# Altium PCB DIO_8SMA_8MCX.PcbDoc (part 1 of 9)
Units mm, origin at the board's own origin, x right, y up, seen from the top; angles counter-clockwise.
Board outline 222.9 x 100 mm, 6 copper layers (TopLayer, L2, L3, L4, L5, Bottom Layer), stack 1.492 mm thick; 542 components, 326 nets, 1968 pads, 1583 vias.
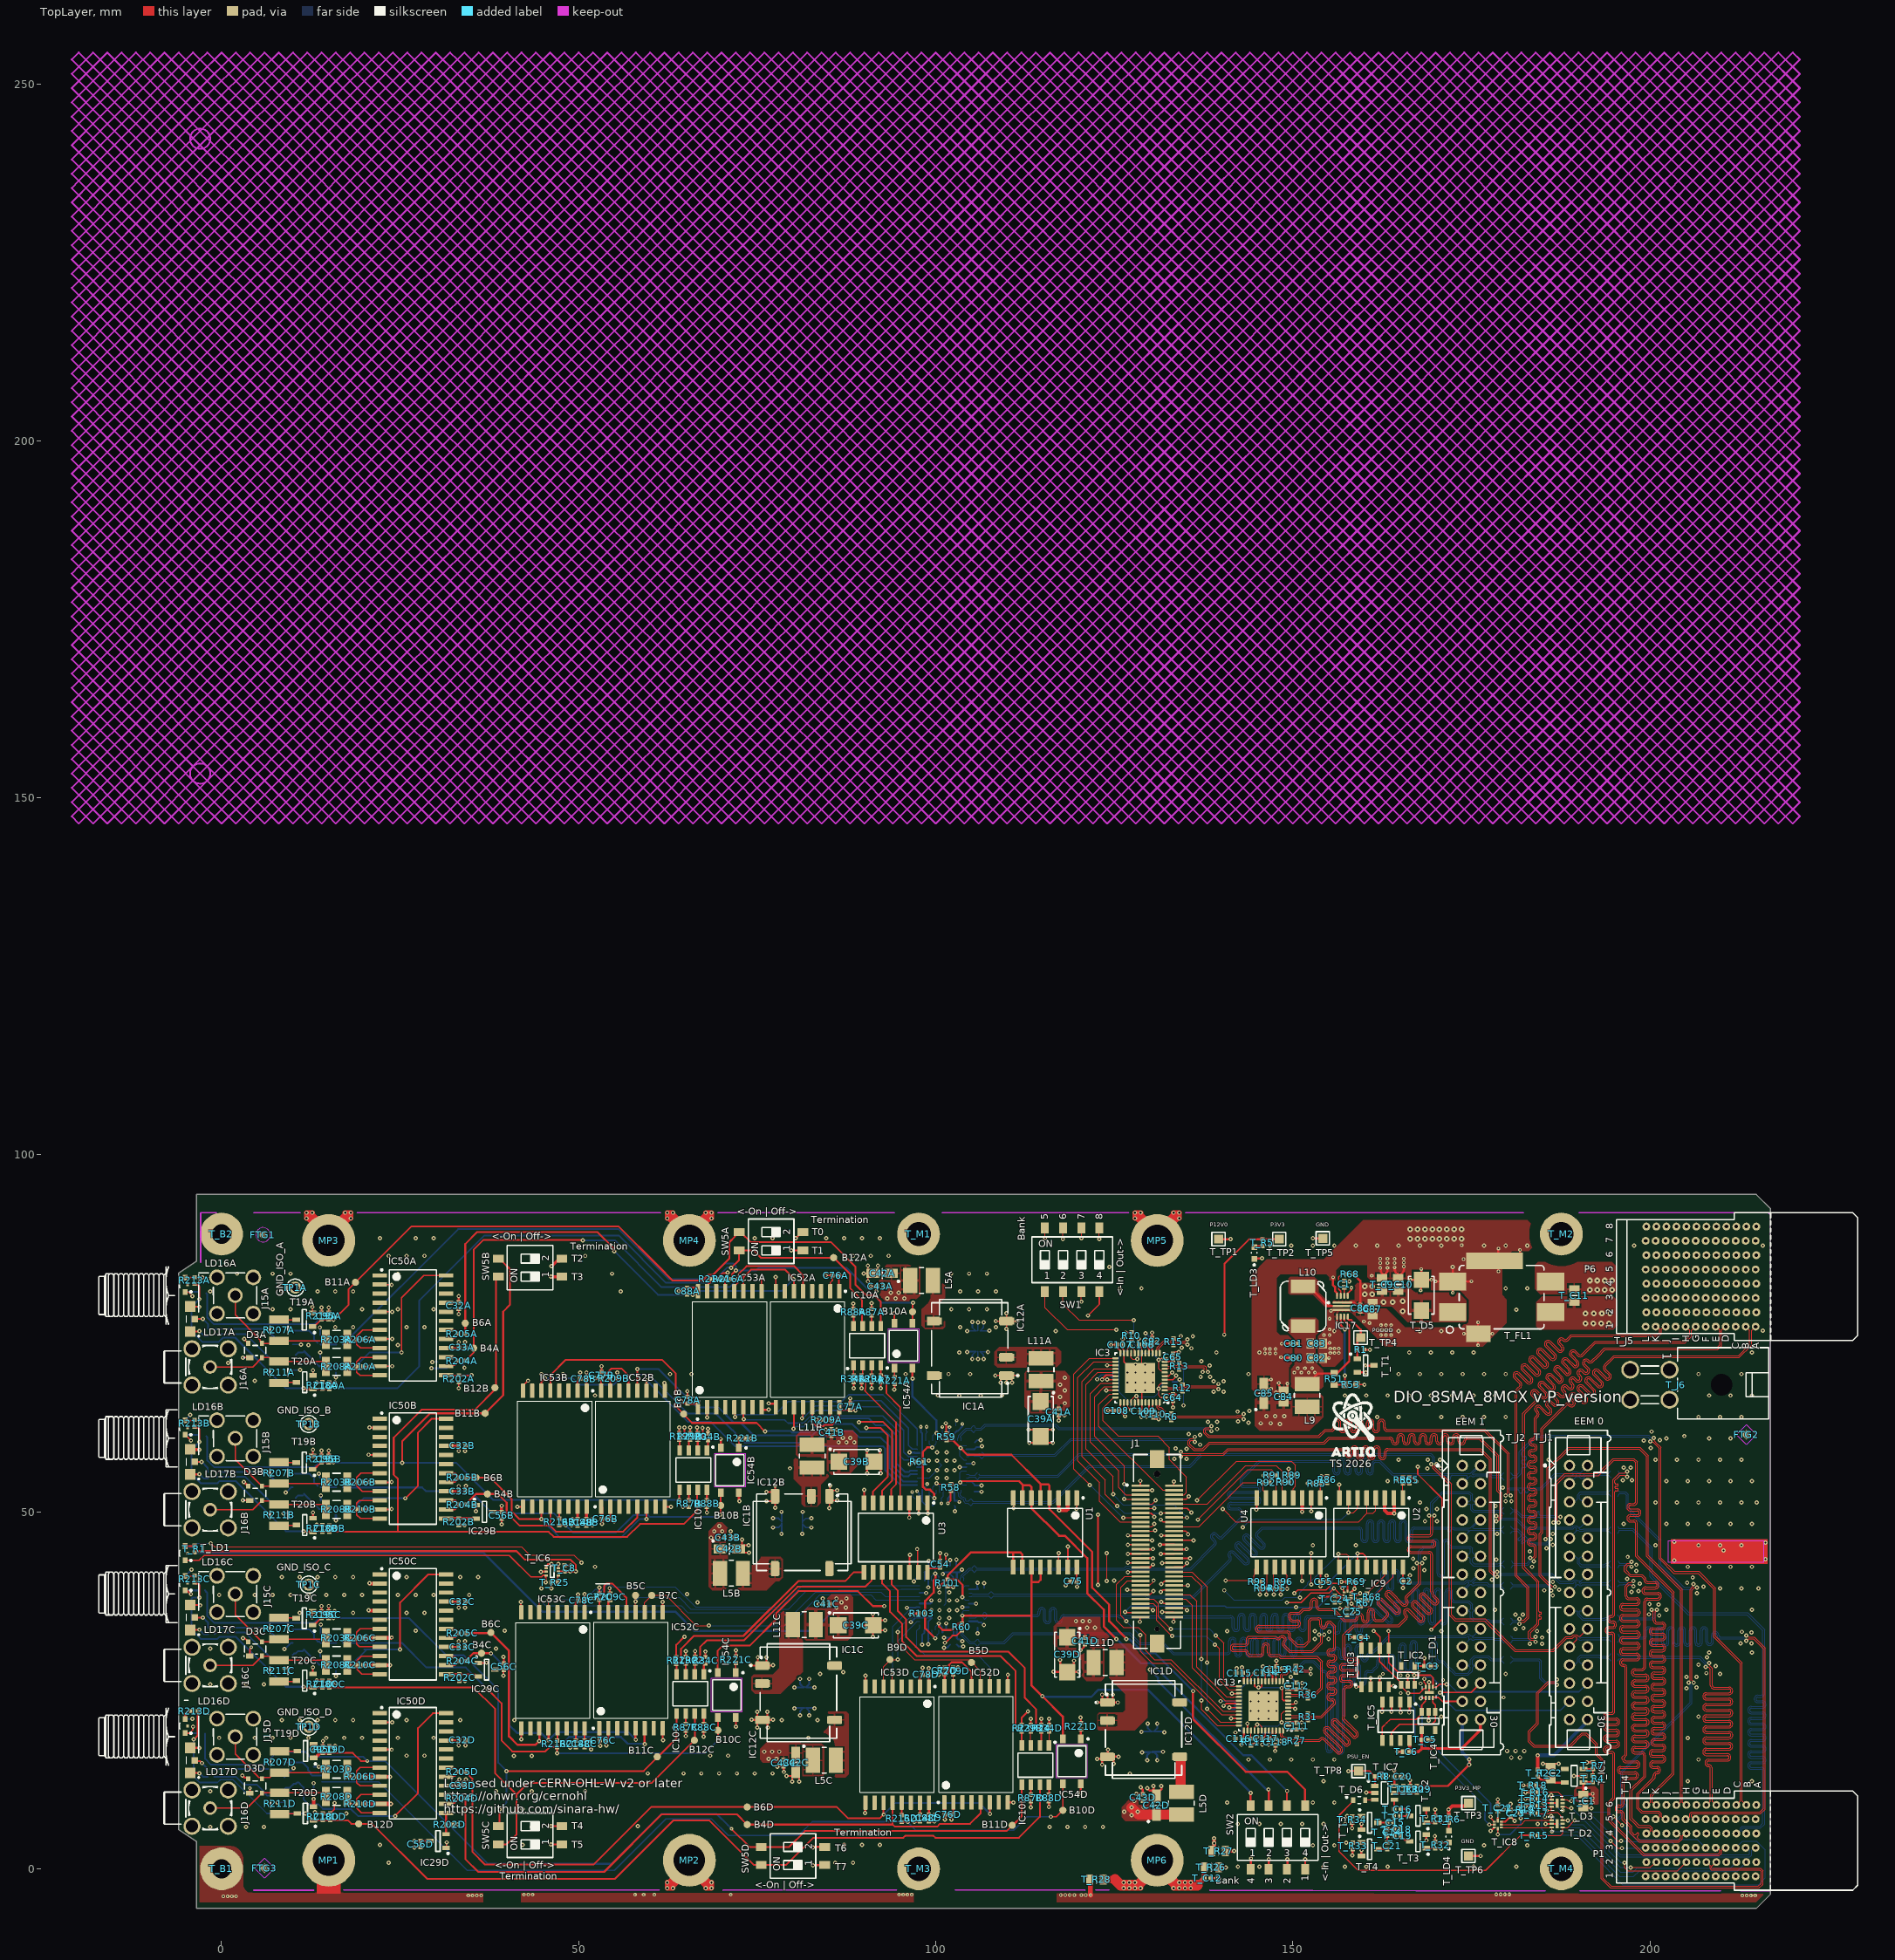
[diagram p0: TopLayer view]
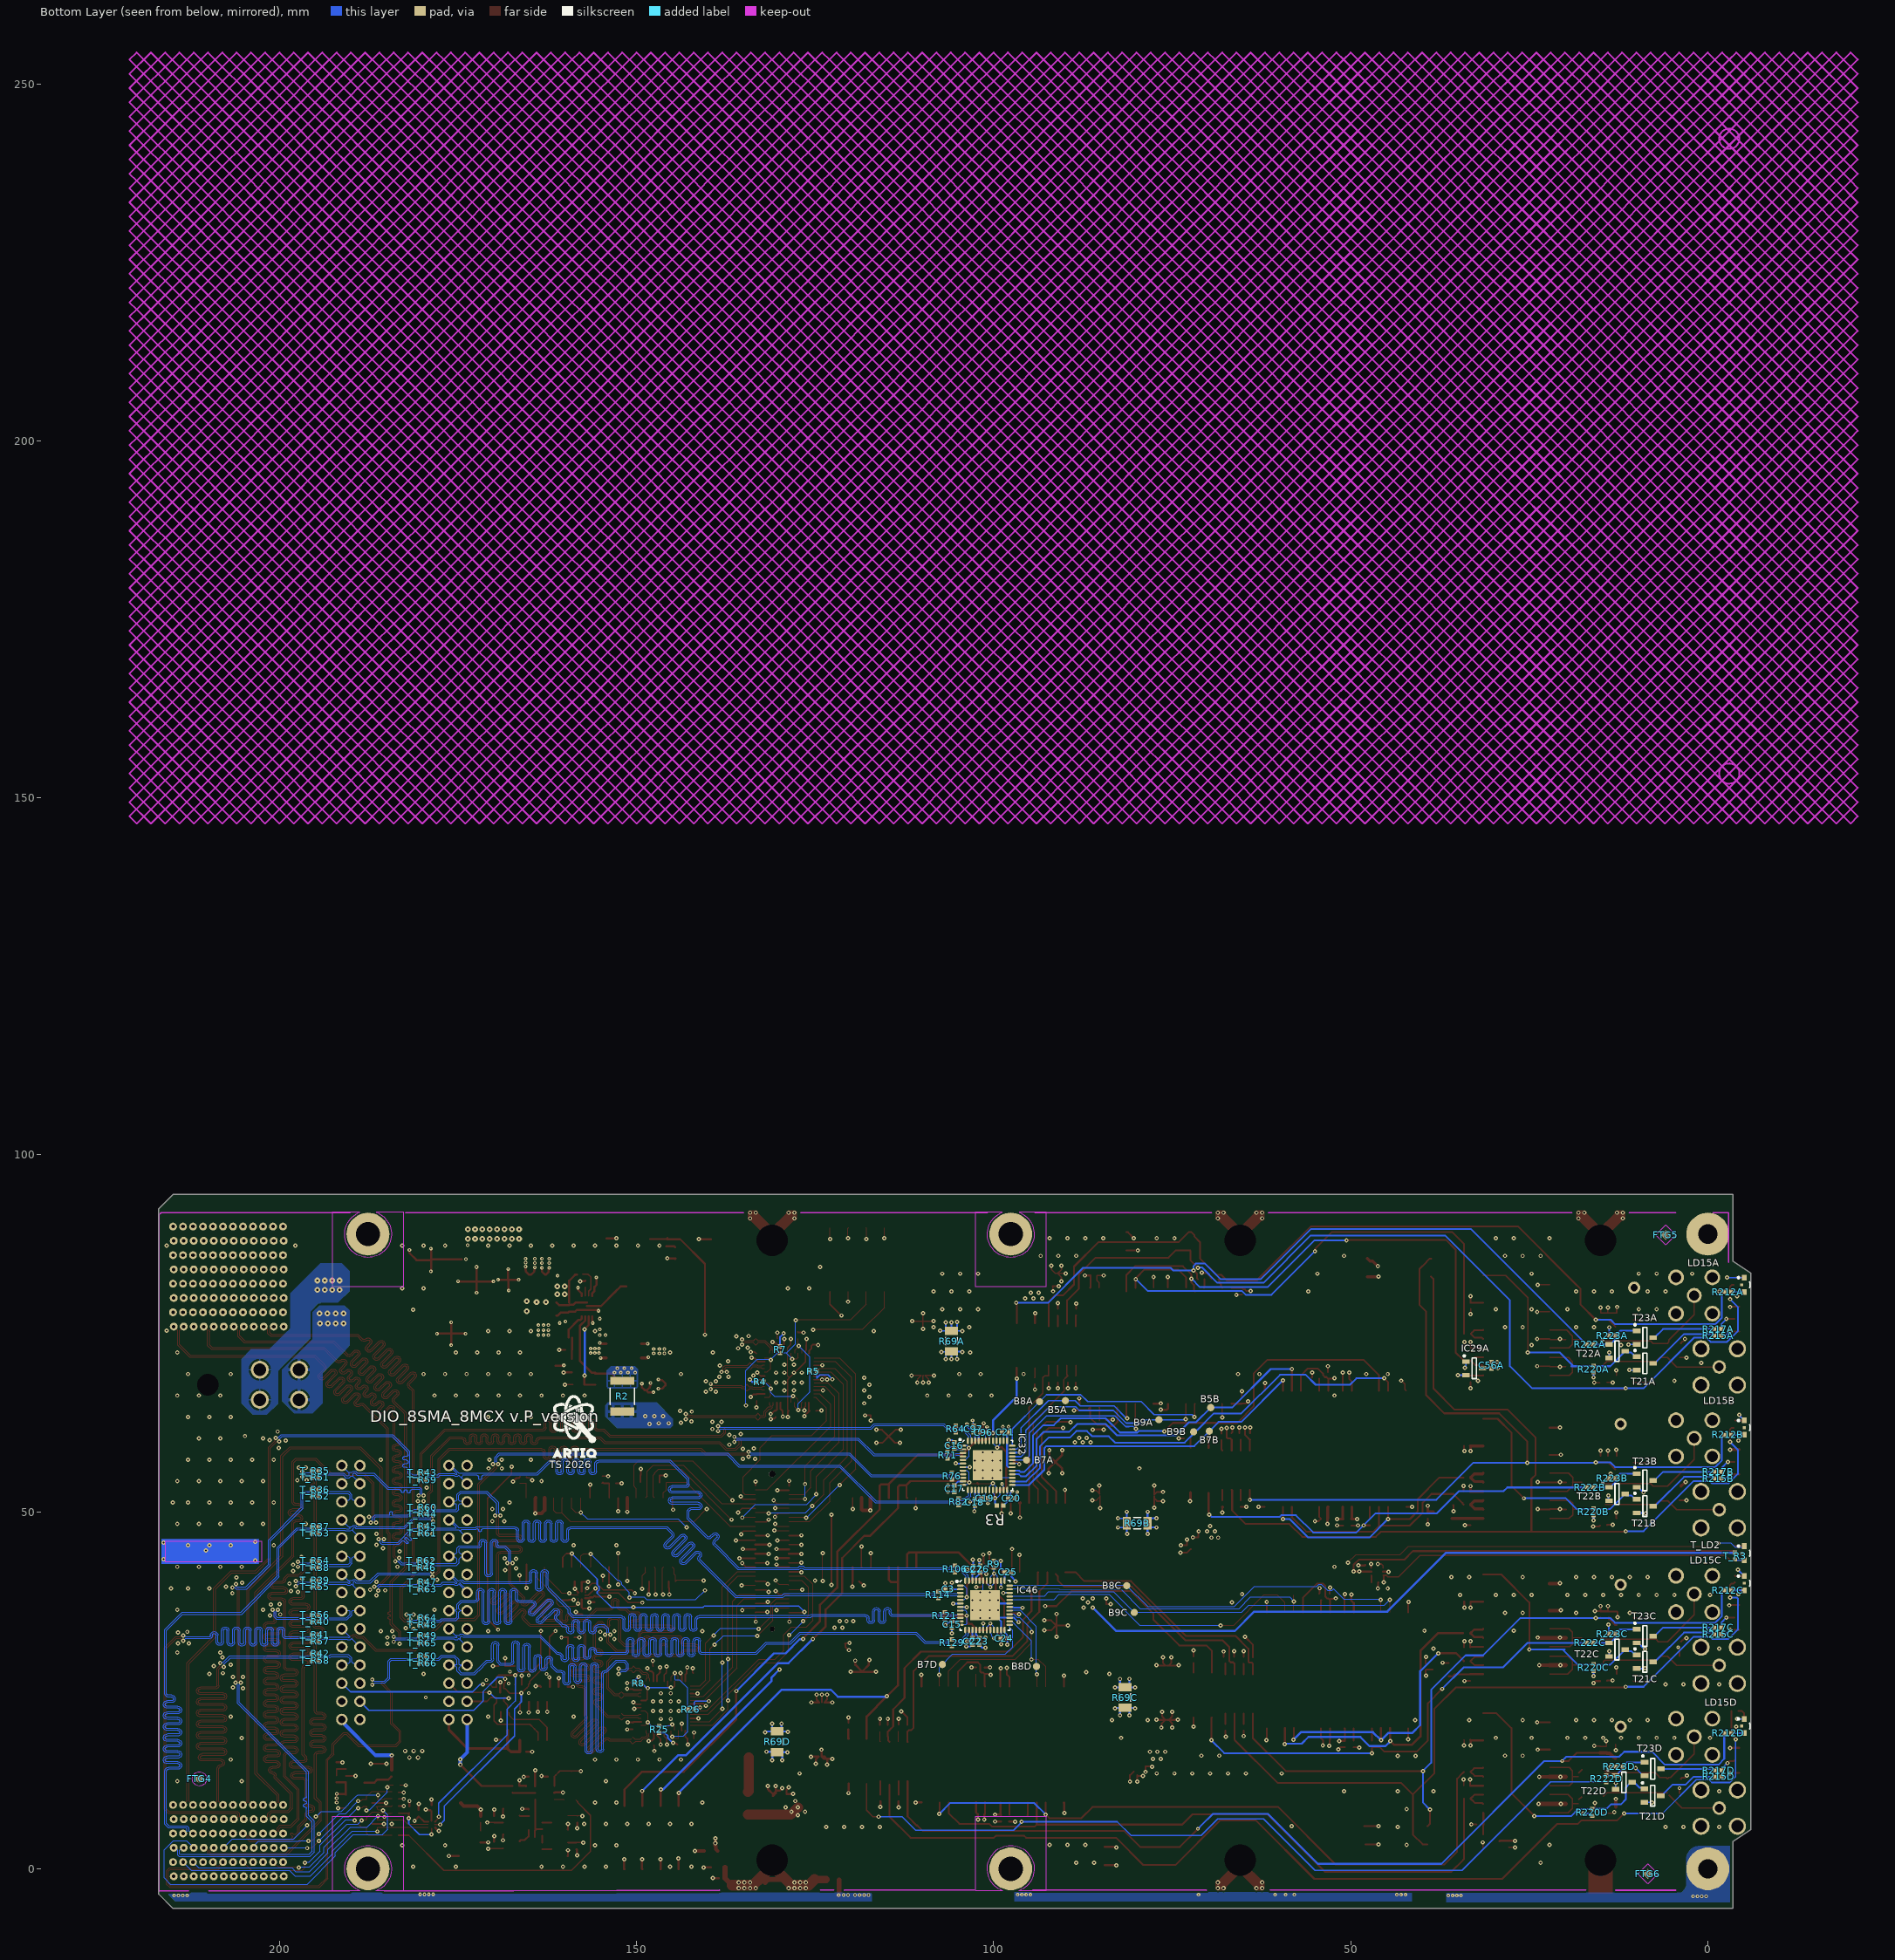
[diagram p1: Bottom Layer view, seen from below]
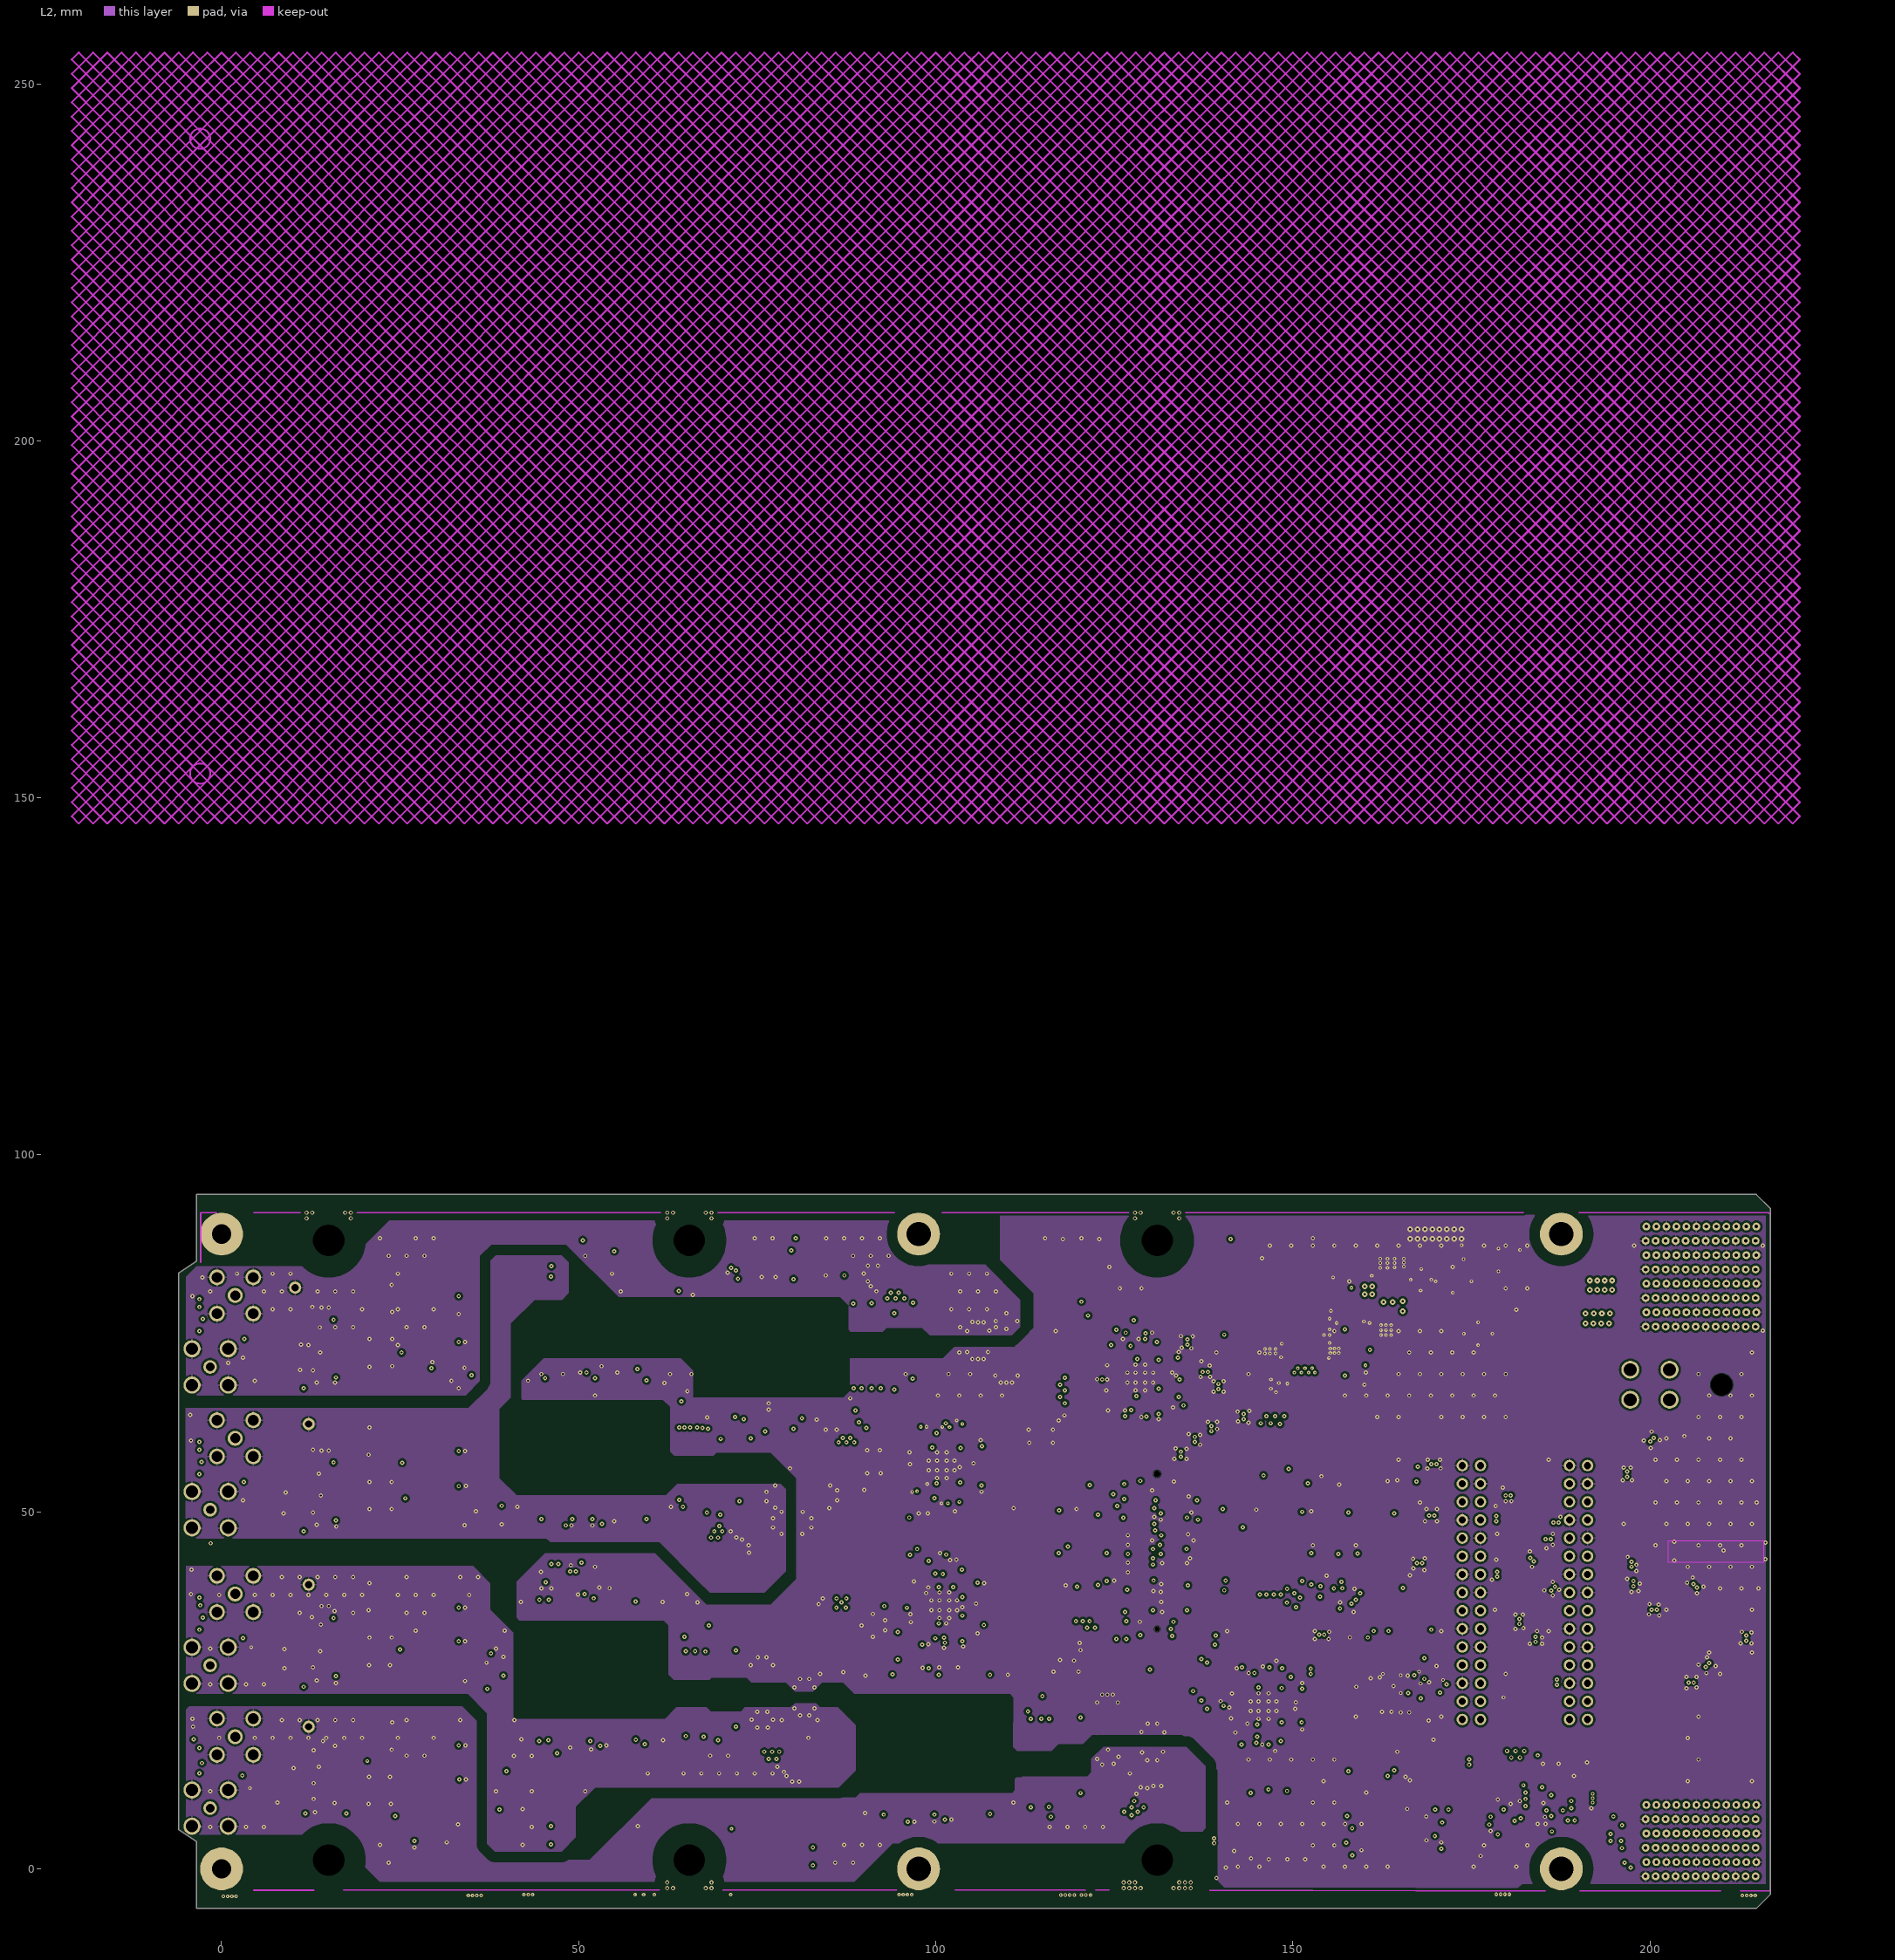
[diagram p2: L2]
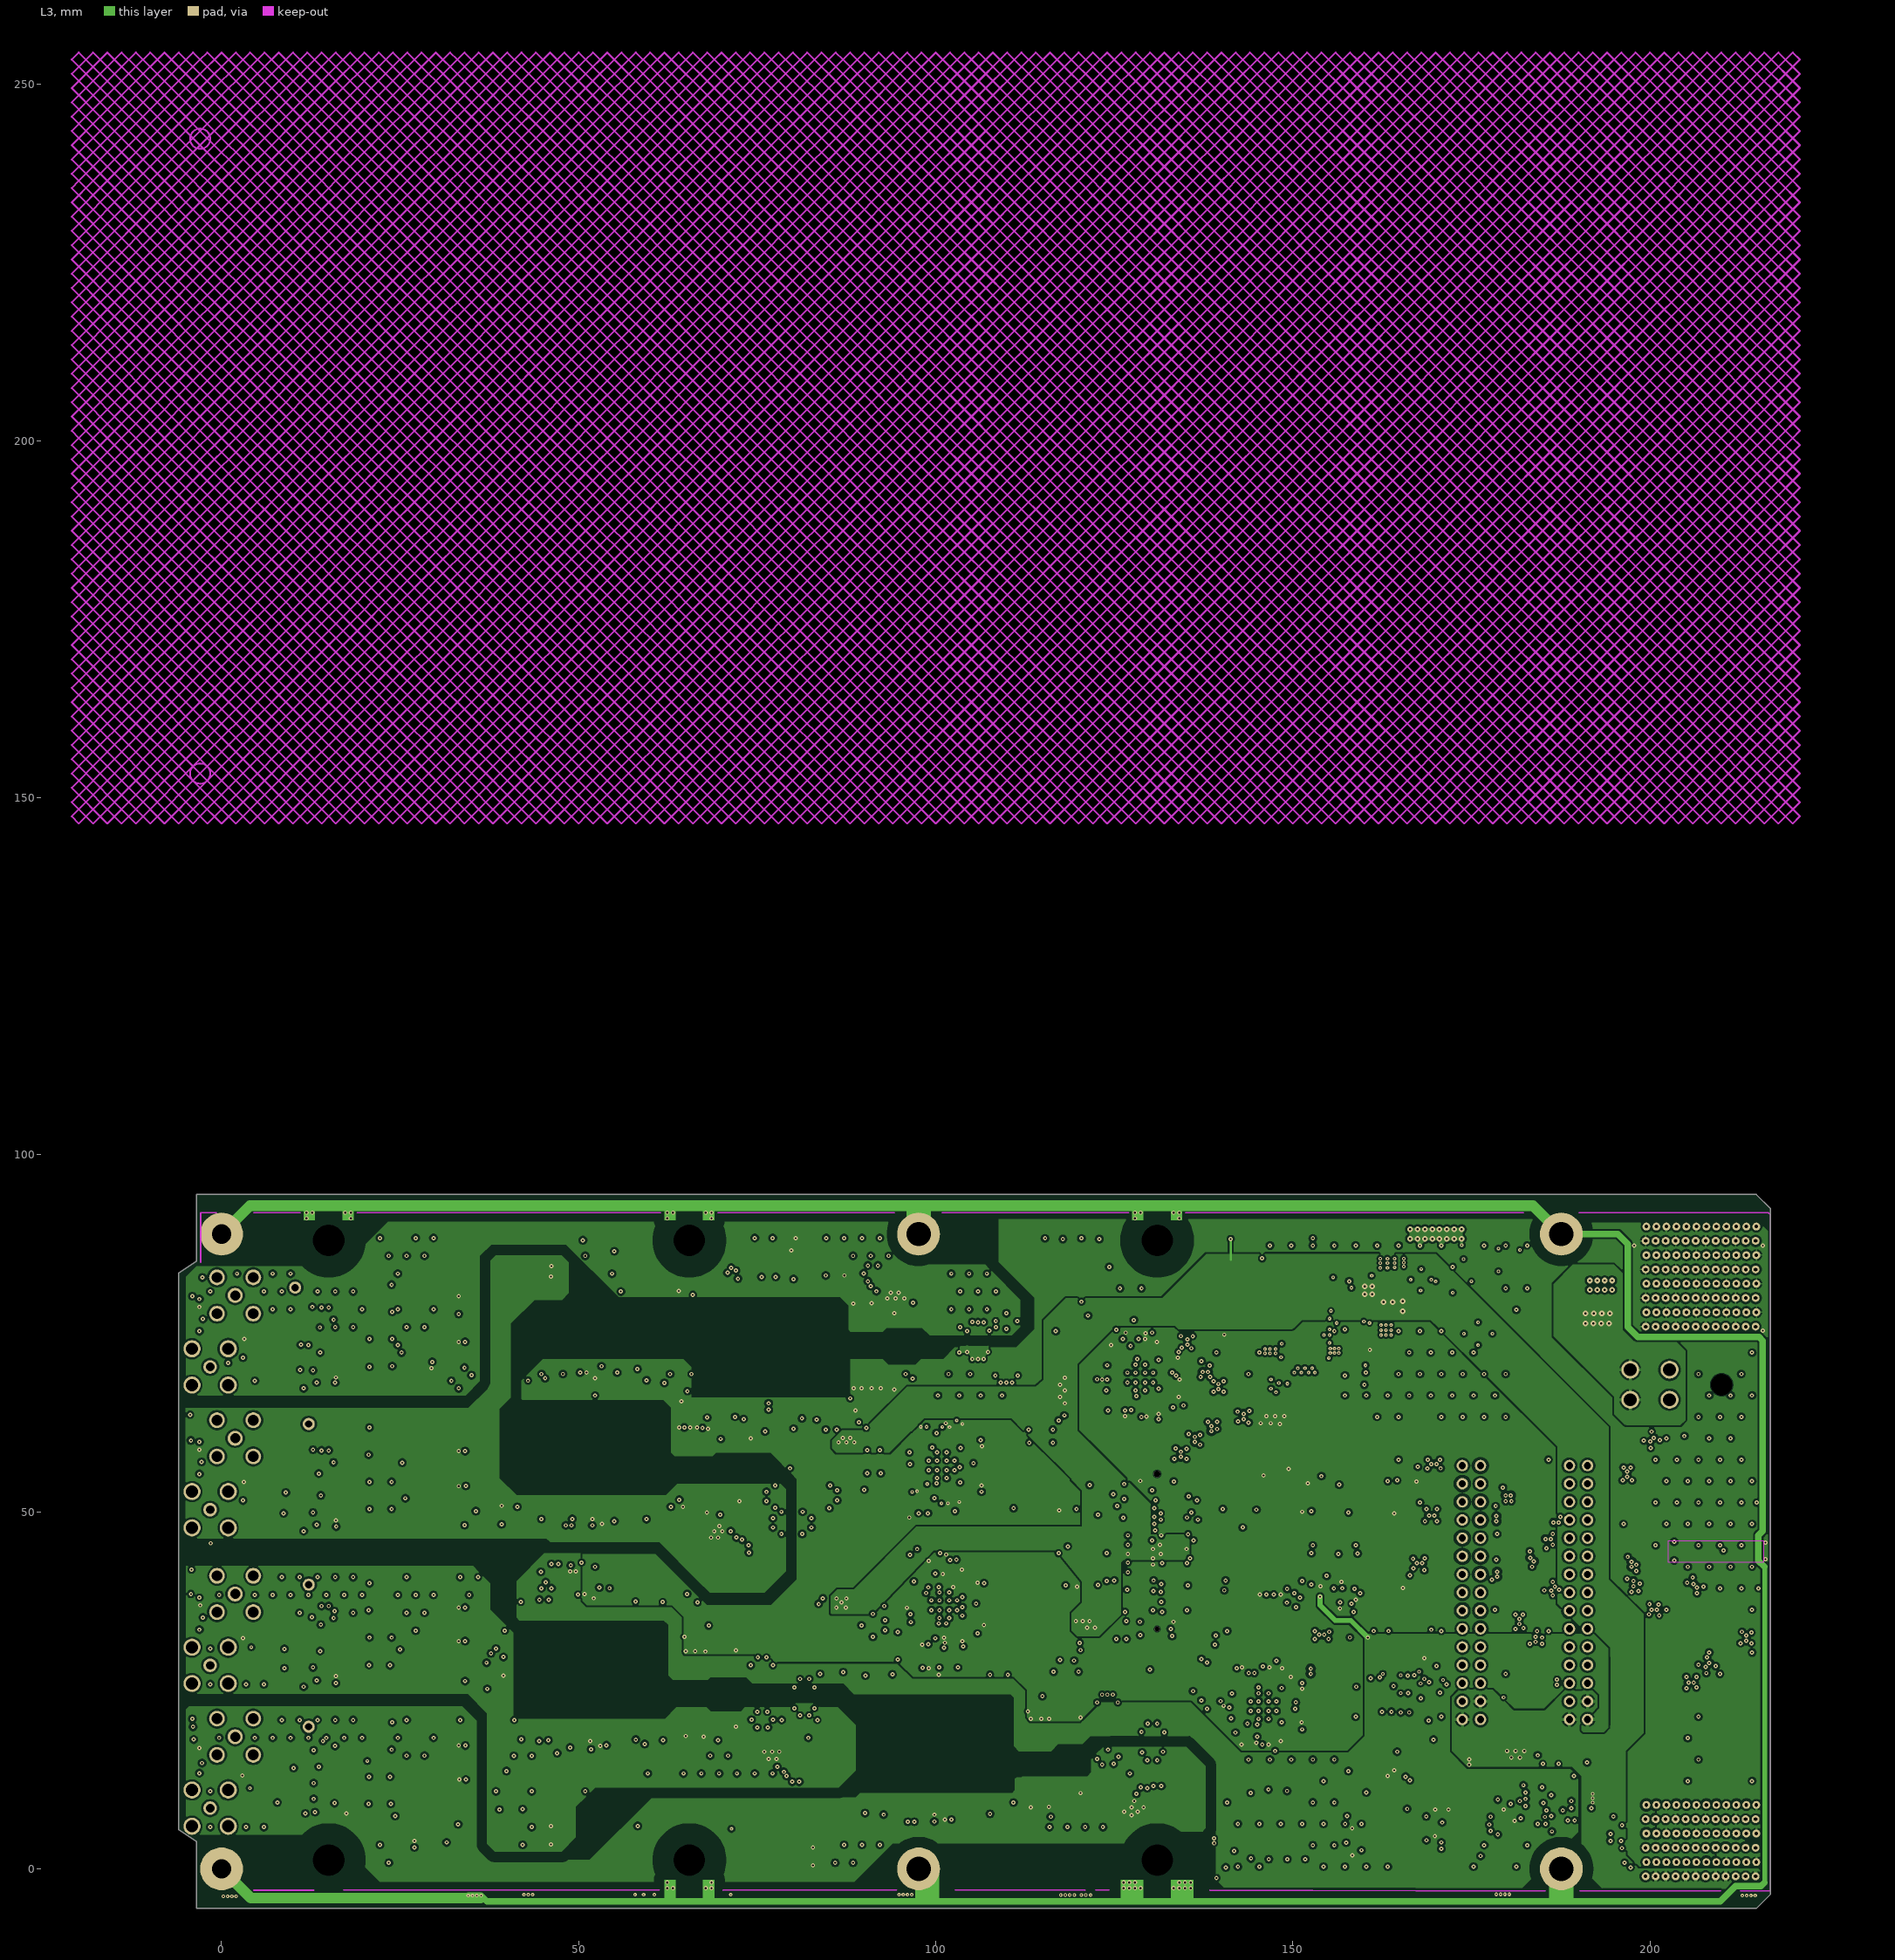
[diagram p3: L3]
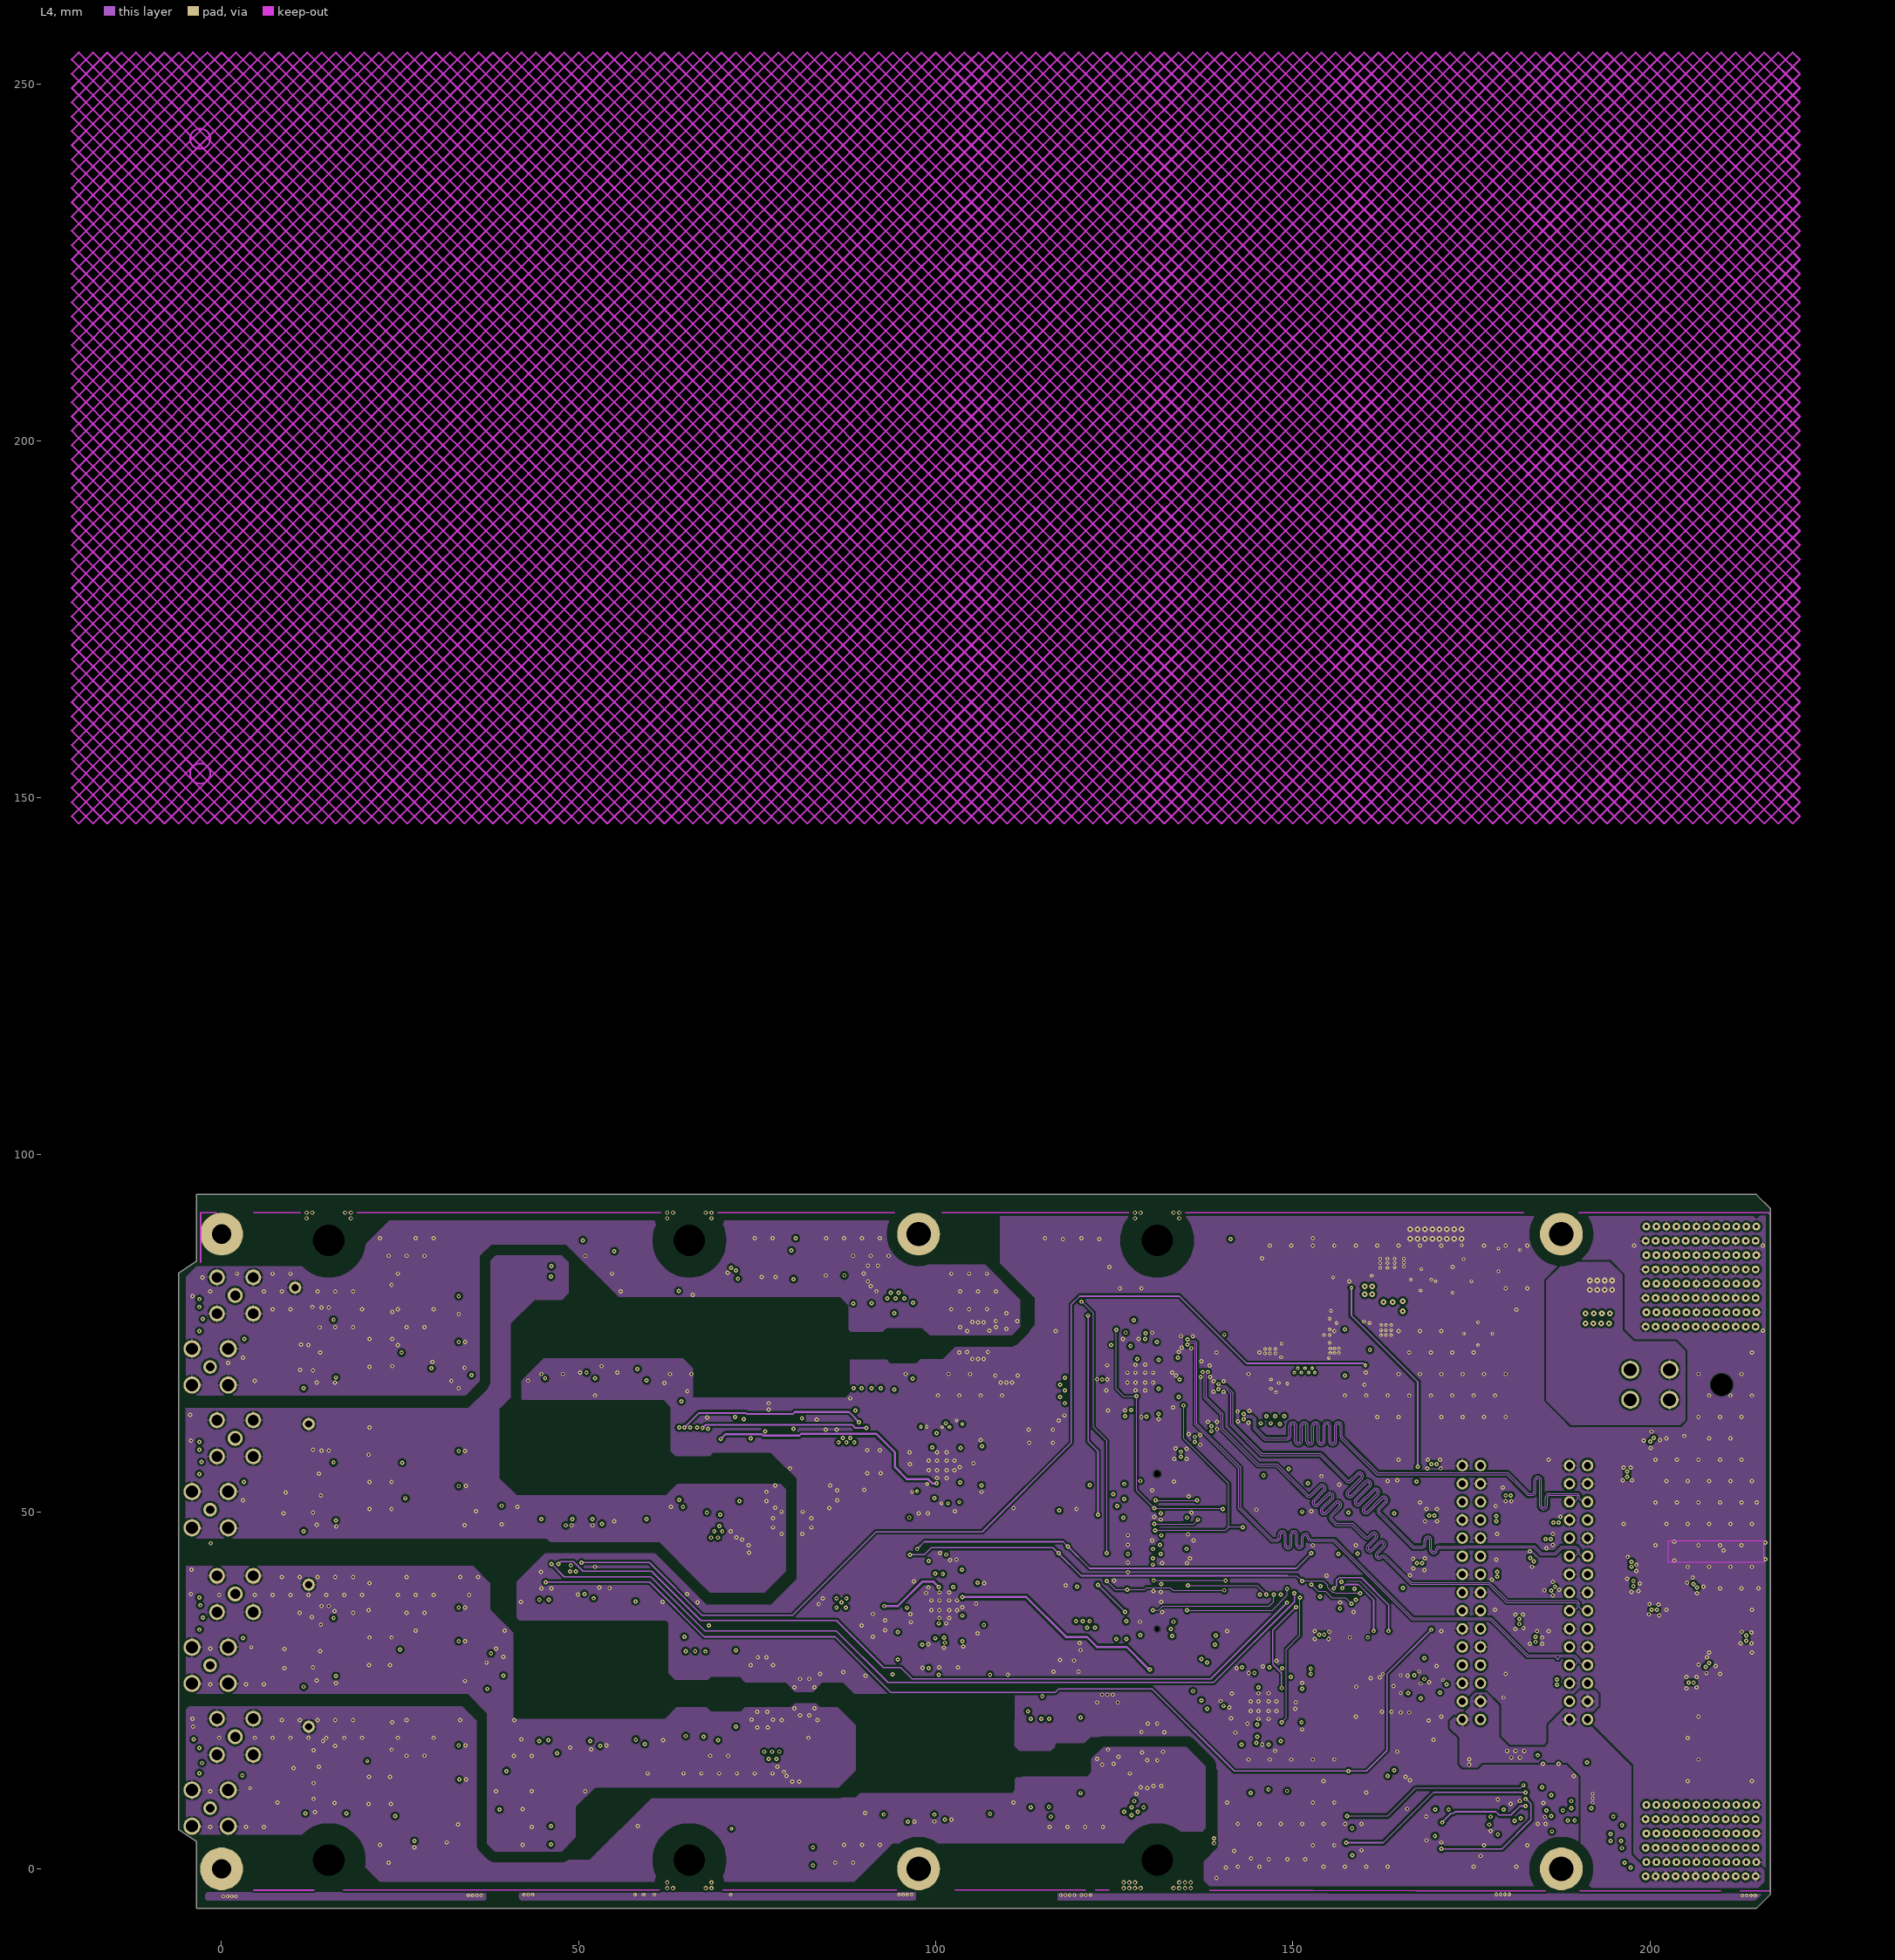
[diagram p4: L4]
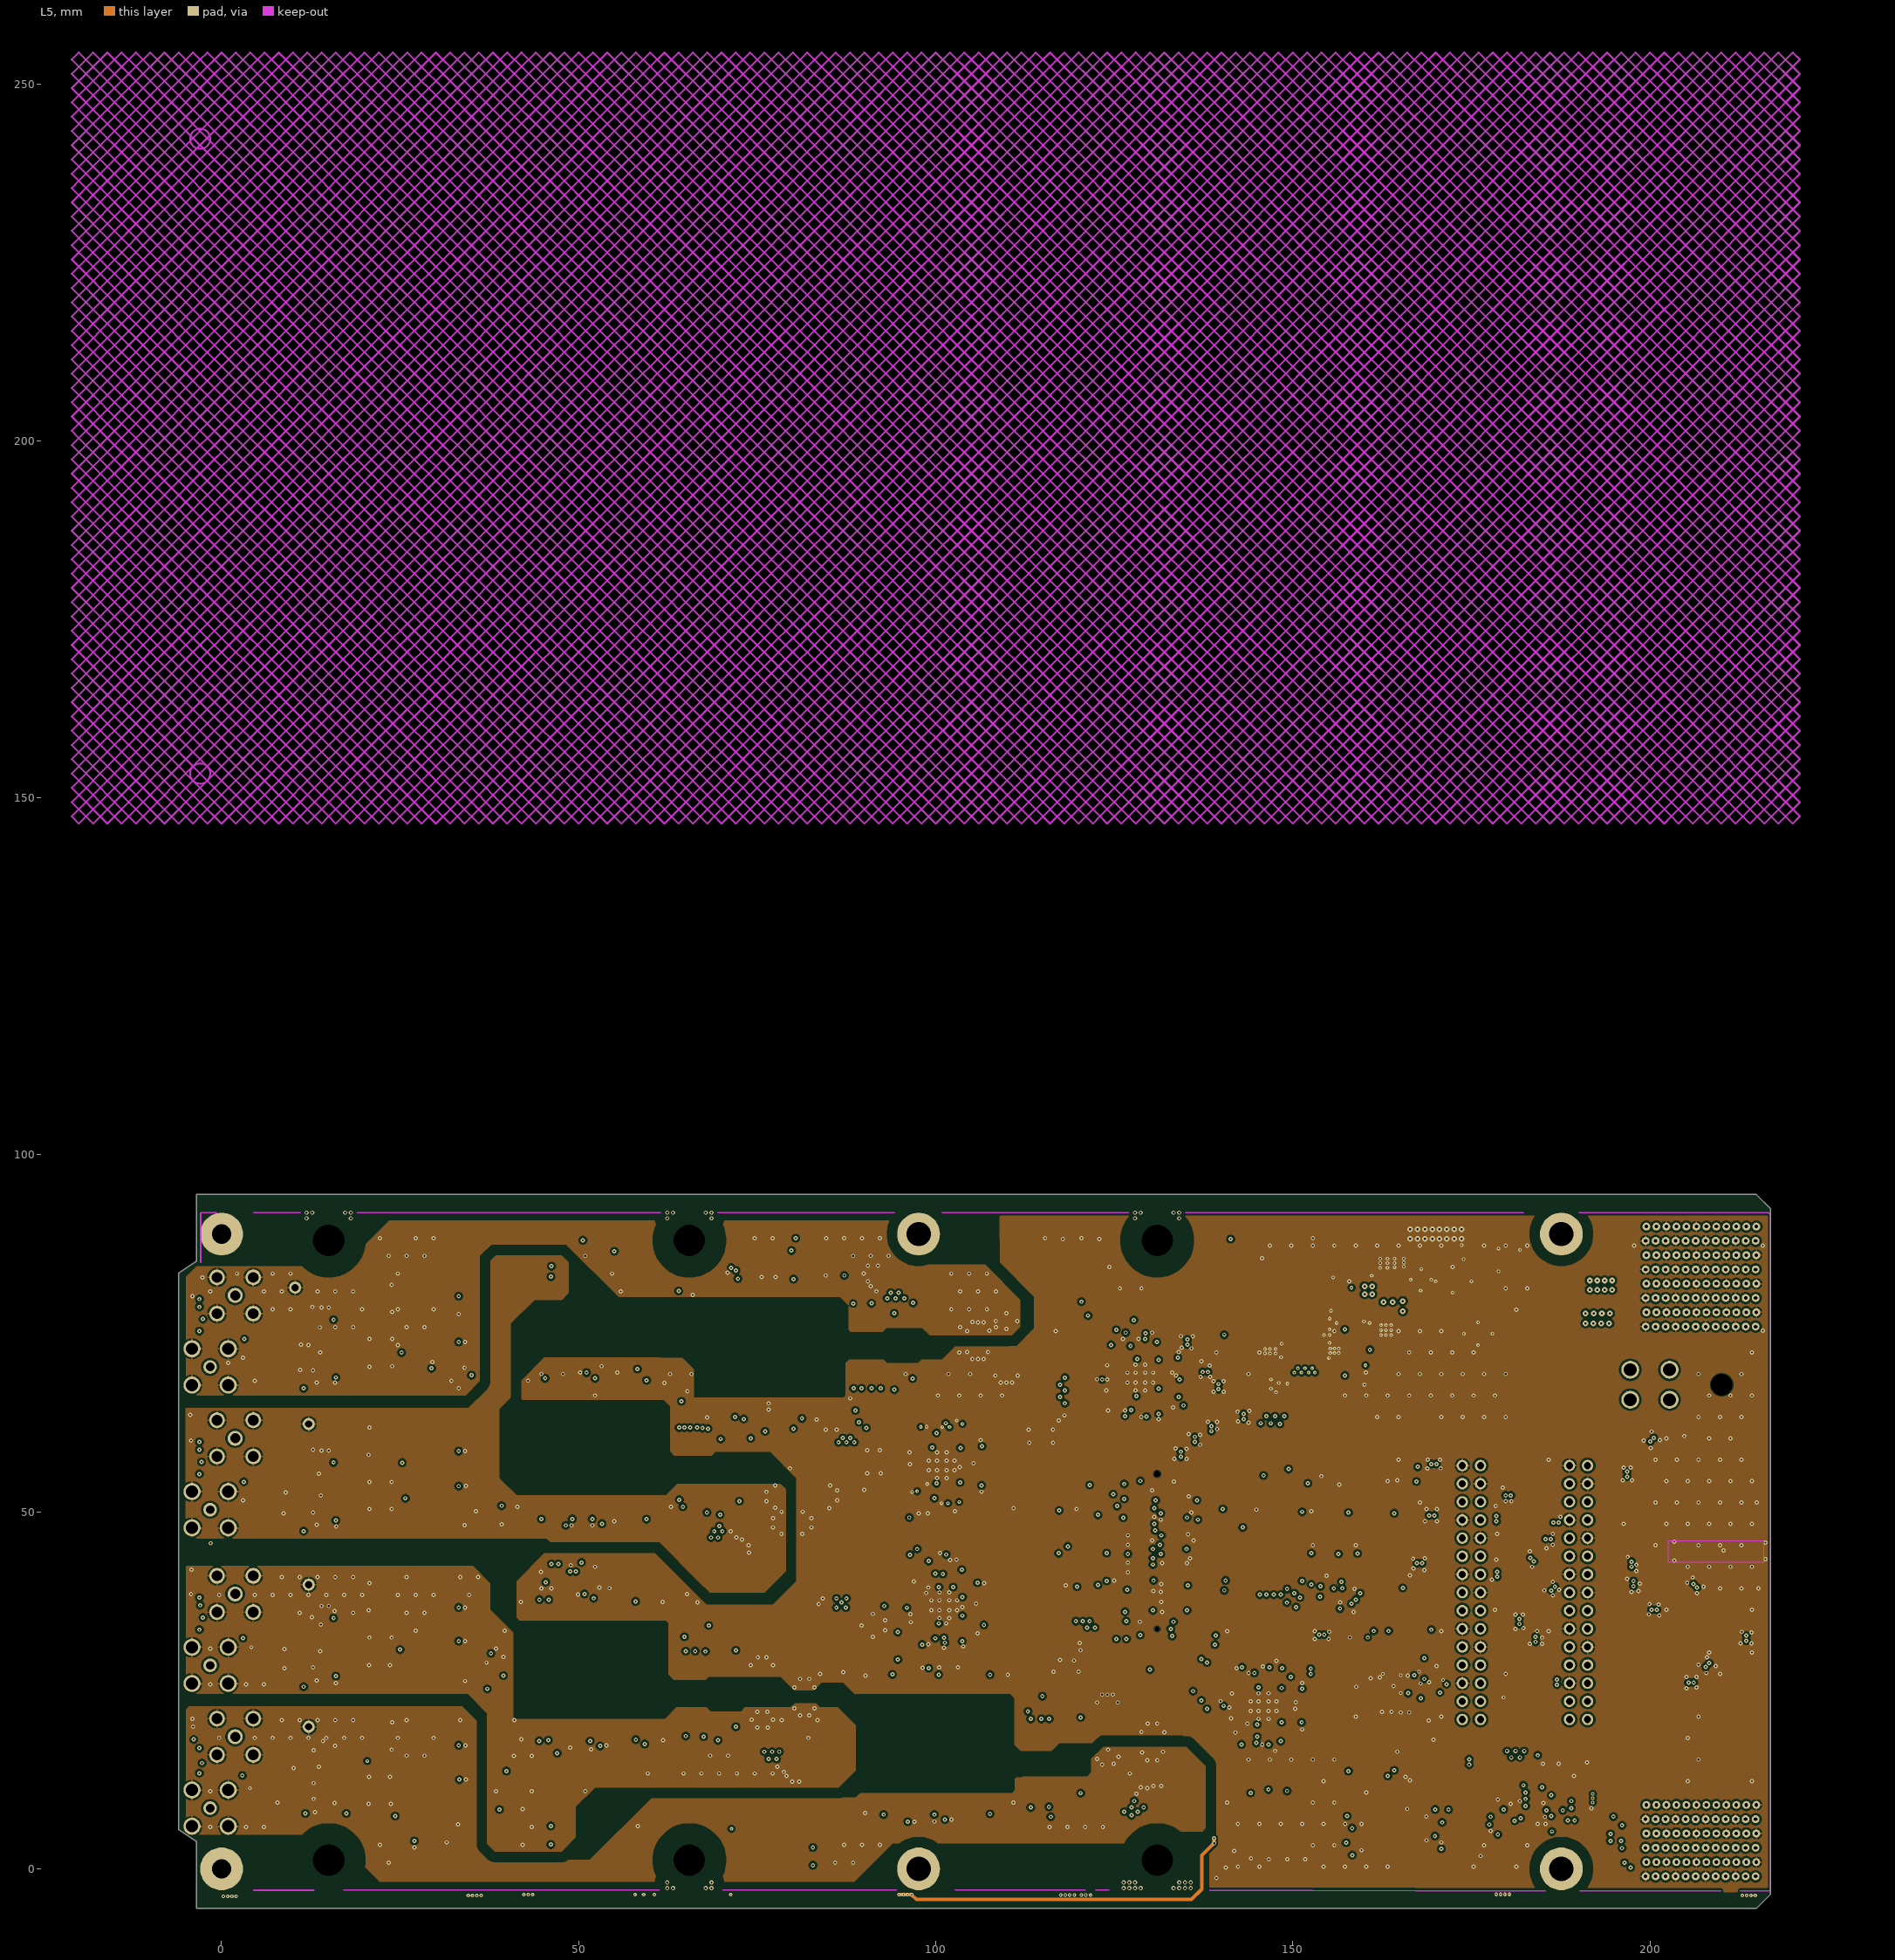
[diagram p5: L5]

## Layer stack, top to bottom
TopSolder: solder mask 0.022, Solder Resist, Dk 3.5
TopLayer: signal copper 0.035
Dielectric1: core 0.11, FR-4, Dk 4.4
L2: signal copper 0.018
Dielectric2: prepreg 0.2, FR-4, Dk 4.2
L3: signal copper 0.018
Dielectric3: core 0.73, FR-4, Dk 4.2
L4: signal copper 0.018
Dielectric 3: prepreg 0.2, FR-4, Dk 4.2
L5: signal copper 0.018
Dielectric 4: core 0.11, FR-4, Dk 4.4
Bottom Layer: signal copper 0.035
BottomSolder: solder mask 0.022, Solder Resist, Dk 3.5

## Board outline
-6,5.45 -6,83.45 -3.5,85.1 -3.5,94.45 214.9,94.45 216.9,92.45 216.9,-3.55 214.9,-5.55 -3.5,-5.55 -3.5,3.8

## Design rules (kind name [scope] priority, off if disabled: settings)
AcuteAngle [All] p1: minimum=4.50000000000000E+0001 checktracksonly=FALSE
AssemblyTestPointUsage [All] p1 off:
AssemblyTestpoint [All] p1 off: testpointundercomponent=TRUE minsize=1.016 maxsize=2.54 preferedsize=1.524 minholesize=0 maxholesize=1.016 preferedholesize=0.813 testpointgrid=0.025 usegrid=TRUE gridtolerance=0 allowsidetop=TRUE allowsidebottom=TRUE
BoardOutlineClearance BoardOutlineClearance_1 [OnLayer('BottomOverlay', 'TopOverlay')] p1: gap=0 ignorepadtopadclearanceinfootprint=FALSE
BoardOutlineClearance [All] p2: gap=0.4 ignorepadtopadclearanceinfootprint=FALSE
Clearance Clearance_MP-keepout [InComponent('T_M*') or InComponent('T_B*') or InComponent('M*') vs IsKeepOut] p1: gap=0 ignorepadtopadclearanceinfootprint=FALSE
Clearance Clearance_CHASSIS-MPx [InComponent('MP*') vs Not (InNet('CHASSIS') or InNet('STRIP2') or InNet('STRIP3'))] p2: gap=3 ignorepadtopadclearanceinfootprint=FALSE except(1.5: Arc-SMDPad Arc-THPad Track-SMDPad Track-THPad SMDPad-SMDPad SMDPad-THPad SMDPad-Via SMDPad-Fill SMDPad-Poly SMDPad-Region SMDPad-Text THPad-THPad THPad-Via THPad-Fill THPad-Poly THPad-Region THPad-Text)
Clearance Clearance_CHASSIS-_T_Bx_T_Mx [InComponent('T_B*') or InComponent('T_M*') vs Not (InNet('CHASSIS') or InNet('STRIP2') or InNet('STRIP3'))] p3: gap=1.5 ignorepadtopadclearanceinfootprint=FALSE
Clearance Clearance_CHASSIS-ISO [InNetClass('GND_ISO') or InNetClass('PWR_ISO') vs InNet('CHASSIS') or InNet('STRIP2') or InNet('STRIP3')] p4: gap=1.5 ignorepadtopadclearanceinfootprint=FALSE
Clearance Clearance_PWR_ISO_CH [InNetClass('PWR_ISO') vs InNetClass('PWR_ISO')] p5: gap=1.5 ignorepadtopadclearanceinfootprint=FALSE
Clearance Clearance_GND_ISO_CH [InNetClass('GND_ISO') vs InNetClass('GND_ISO')] p6: gap=1.5 ignorepadtopadclearanceinfootprint=FALSE
Clearance Clearance_ISO-poly [InNetClass('GND_ISO') or InNetClass('PWR_ISO') vs InPolygon and NOT (InNetClass('GND_ISO') or InNetClass('PWR_ISO'))] p7: gap=1.5 ignorepadtopadclearanceinfootprint=FALSE
Clearance Clearance_xSigToGND [InAnyxSignal vs InNamedPolygon('P3V3')] p8: gap=0.4 ignorepadtopadclearanceinfootprint=TRUE
Clearance [All] p9: gap=0.12 ignorepadtopadclearanceinfootprint=FALSE except(0.3: Arc-Poly Track-Poly SMDPad-Poly THPad-Poly Via-Poly Fill-Poly Poly-Poly)
ComponentClearance ComponentClearance_Front_Panel [InComponent('LD15*') or InComponent('LD16*') or InComponent('LD17*') or InComponent('J15*') or InComponent('J16*') Or InComponent('LD11') or InComponent('LD14') or InComponent('T_B1') or InComponent('T_B2') or InComponent('T_LD2') or InComponent('T_LD1') vs Identifier='Dio8Sma8Mcx-A01.iam.v1'] p1: gap=-1 collisioncheckmode=3 verticalgap=-1 showdistances=TRUE
ComponentClearance ComponentClearance_Screws [InComponent('T_M*') vs IsKeepOut] p2: gap=-1 collisioncheckmode=3 verticalgap=-1 showdistances=FALSE
ComponentClearance ComponentClearance_ISO [InComponent('IC12*') vs InComponent('IC1*')] p3: gap=-1 collisioncheckmode=3 verticalgap=-1 showdistances=FALSE
ComponentClearance ComponentClearance_Enclosure [InComponent('T_M*') vs OnTop] p4: gap=-1 collisioncheckmode=3 verticalgap=-1 showdistances=TRUE
ComponentClearance ComponentClearance_4 [InComponent('HS1') vs InComponent('IC4')] p5: gap=0 collisioncheckmode=3 verticalgap=0 showdistances=FALSE
ComponentClearance ComponentClearance_3 [Identifier = '2';] p6: gap=0 collisioncheckmode=3 verticalgap=0 showdistances=FALSE
ComponentClearance ComponentClearance_2 [Identifier = 'INL23001-10-1.7Y T725 - 05-Sep-2019';] p7: gap=0 collisioncheckmode=3 verticalgap=0 showdistances=FALSE
ComponentClearance ComponentClearance_1 [Identifier = '30848356-EEMFMC-A01.v1';] p8: gap=0 collisioncheckmode=3 verticalgap=0 showdistances=FALSE
ComponentClearance ComponentClearance_exception2 [InComponent('C1', 'C2','C9','C11','C29','C30','C17','C14','R2','R4','C217','C218','C210','C211','R263') vs InComponent('R6', 'R8', 'C5','C7','B1','C13','R21','R20','C19','C20', 'C12','C215','C216','C213','C214','R19')] p9: gap=0 collisioncheckmode=3 verticalgap=0 showdistances=FALSE
ComponentClearance ComponentClearance_exception1 [InComponent('TR1', 'TR2') vs InComponent('R1', 'R14' ,'R18' , 'R17')] p10: gap=0 collisioncheckmode=3 verticalgap=0 showdistances=FALSE
ComponentClearance ComponentClearance_exceptions [InComponent('J10') vs InComponent('J11')] p11: gap=0 collisioncheckmode=3 verticalgap=0 showdistances=FALSE
ComponentClearance [All] p12: gap=0.254 collisioncheckmode=3 verticalgap=0.254 showdistances=FALSE
DiffPairsRouting DiffPairsRouting_100_Ohm [InDifferentialPairClass('Diff_100Ohm')] p1: maxlimit=0.5 minlimit=0.145 mostfreqgap=0.5 toplayer_maxgap=0.145 toplayer_prefgap=0.145 toplayer_minwidth=0.116 toplayer_maxwidth=0.116 toplayer_prefwidth=0.116 midlayer2_maxgap=0.145 midlayer2_prefgap=0.145 midlayer2_minwidth=0.127 midlayer2_maxwidth=0.127 midlayer2_prefwidth=0.127 midlayer7_maxgap=0.145 midlayer7_prefgap=0.145 midlayer7_minwidth=0.127 midlayer7_maxwidth=0.127 midlayer7_prefwidth=0.127 bottomlayer_maxgap=0.145 bottomlayer_prefgap=0.145 bottomlayer_minwidth=0.116 bottomlayer_maxwidth=0.116 bottomlayer_prefwidth=0.116 impedanceprofiledriven=TRUE impedanceprofileid={FB752EDA-940F-4D5F-A599-D27A4E1750A0} impedanceprofilevalue=100.000000 maxuncoupledlength=11.1
FabricationTestPointUsage TestPointUsage [All] p1: valid=0 allowmultiple=FALSE
FabricationTestpoint Testpoint [All] p1: side=3 testpointundercomponent=TRUE minsize=1.016 maxsize=2.54 preferedsize=1.524 minholesize=0.508 maxholesize=1.016 preferedholesize=0.813 testpointgrid=0.025 allowsidetop=TRUE allowsidebottom=TRUE usegrid=TRUE gridtolerance=0
Height Height_BOT [OnBottom] p1: minheight=0 maxheight=1.6 prefheight=1
Height [All] p2: minheight=0 maxheight=25.4 prefheight=12.7
HoleSize [All] p1: absolutevalues=TRUE maxlimit=4.5 minlimit=0.15 maxpercent=80.000 minpercent=20.000
HoleToHoleClearance [All] p1: gap=0.15 allowstackedmicrovias=TRUE
MatchedLengths MatchedLengths_EEM_in [InxSignalClass('xEEM')] p1: tolerance=10 checknetsindiffpair=TRUE checkdiffpairvsdiffpair=FALSE checkxsignals=FALSE checkothers=FALSE usedelayunits=TRUE delaytolerance=5.000000
MatchedLengths MatchedLengths_EEM_g [InxSignalClass('xEEM')] p2: tolerance=10 checknetsindiffpair=FALSE checkdiffpairvsdiffpair=TRUE checkxsignals=TRUE checkothers=TRUE usedelayunits=TRUE delaytolerance=10.000000
MatchedLengths MatchedLengths_CPCIS_in [InxSignalClass('xCPCIS')] p3: tolerance=10 checknetsindiffpair=TRUE checkdiffpairvsdiffpair=FALSE checkxsignals=FALSE checkothers=FALSE usedelayunits=TRUE delaytolerance=5.000000
MatchedLengths MatchedLengths_CPCIS_g [InxSignalClass('xCPCIS')] p4: tolerance=10 checknetsindiffpair=FALSE checkdiffpairvsdiffpair=TRUE checkxsignals=TRUE checkothers=TRUE usedelayunits=TRUE delaytolerance=10.000000
MinimumSolderMaskSliver MinimumSolderMaskSliver_IC13 [InComponent('IC13') or HasFootprint('FXMA2102UMX')] p1: minsoldermaskwidth=0.025
MinimumSolderMaskSliver [All] p2: minsoldermaskwidth=0.095
ParallelSegment [All] p1 off: limit=5 gap=0.254
PlaneClearance [All] p1: clearance=0.254
PlaneConnect PlaneConnect_1 [HasCompParameterValue('PressFit', 'Yes')] p1: planeconnectstyle=Direct reliefexpansion=0.2 reliefentries=4 reliefconductorwidth=0.254 reliefairgap=0.254
PlaneConnect [All] p2: pad.planeconnectstyle=Relief pad.reliefexpansion=0.2 pad.reliefentries=4 pad.reliefconductorwidth=0.254 pad.reliefairgap=0.254 via.planeconnectstyle=Direct via.reliefexpansion=0.2 via.reliefentries=4 via.reliefconductorwidth=0.254 via.reliefairgap=0.15
PolygonConnect PolygonConnect_1 [InNamedPolygon('esd1_direct')] p1: connectstyle=Direct reliefconductorwidth=0.254 reliefentries=2 polygonreliefangle="45 Angle" airgapwidth=0.254
PolygonConnect PolygonConnect_2 [InNetClass('PWR')] p2: thpad.connectstyle=Relief thpad.reliefconductorwidth=0.5 thpad.reliefentries=4 thpad.polygonreliefangle="90 Angle" thpad.airgapwidth=0.254 smdpad.connectstyle=Relief smdpad.reliefconductorwidth=0.5 smdpad.reliefentries=4 smdpad.polygonreliefangle="90 Angle" smdpad.airgapwidth=0.25 via.connectstyle=Direct via.reliefconductorwidth=0.254 via.reliefentries=2 via.polygonreliefangle="90 Angle" via.airgapwidth=0.254
PolygonConnect [All] p3: thpad.connectstyle=Relief thpad.reliefconductorwidth=0.254 thpad.reliefentries=4 thpad.polygonreliefangle="90 Angle" thpad.airgapwidth=0.254 smdpad.connectstyle=Relief smdpad.reliefconductorwidth=0.254 smdpad.reliefentries=4 smdpad.polygonreliefangle="90 Angle" smdpad.airgapwidth=0.254 via.connectstyle=Direct via.reliefconductorwidth=0.254 via.reliefentries=4 via.polygonreliefangle="90 Angle" via.airgapwidth=0.254
RoomDefinition U_PWR_Supply [InComponentClass('U_PWR_Supply')] p1: confinementstyle=ConfineIn formatcopy=TRUE lockcomponents=FALSE outline 218.068,33.65 239.268,33.65 239.268,38.65 218.068,38.65
RoomDefinition Overlapping [InComponentClass('Overlapping')] p2: confinementstyle=ConfineIn formatcopy=TRUE lockcomponents=FALSE outline -52.832,-101.65 -2.032,-101.65 -2.032,-76.25 -52.832,-76.25
RoutingLayers RoutingLayers_1 [InAnyDifferentialPair] p1: top layer_v5=TRUE mid layer 1_v5=FALSE mid layer 2_v5=TRUE mid layer 3_v5=TRUE mid layer 7_v5=TRUE bottom layer_v5=TRUE
RoutingLayers RoutingLayers_2 [InNetClass('50Ohm')] p2: top layer_v5=TRUE mid layer 1_v5=FALSE mid layer 2_v5=TRUE mid layer 3_v5=TRUE mid layer 7_v5=TRUE bottom layer_v5=TRUE
RoutingLayers RoutingLayers_3 [InNet('GND')] p3: top layer_v5=TRUE mid layer 1_v5=TRUE mid layer 2_v5=TRUE mid layer 3_v5=TRUE mid layer 7_v5=TRUE bottom layer_v5=TRUE
RoutingLayers [All] p4: top layer_v5=TRUE mid layer 1_v5=TRUE mid layer 2_v5=TRUE mid layer 3_v5=TRUE mid layer 7_v5=TRUE bottom layer_v5=TRUE
RoutingVias [All] p1: holewidth=0.3 width=0.8 viastyle="Through Hole" minholewidth=0.2 minwidth=0.5 maxholewidth=0.6 maxwidth=1 viatemplateguid#1={265D2900-223E-4194-B99B-AF9CD26B419D} viatemplateguid#2={168CC3D4-46A9-4D9D-BB95-029752B0A818} viatemplateguid#3={7BA2FAF8-F5E9-4BF3-9BD8-21DB5C2C29C0} viatemplatename#1=v50h20 viatemplatename#2=v40h20 viatemplatename#3=v80h50
SMDEntry [All] p1 off: side=TRUE corner=TRUE anyangle=FALSE
ShortCircuit ShortCircuit_1 [InComponent('IC12*') vs InComponent('IC1*')] p1: allowed=TRUE
ShortCircuit [All] p2: allowed=FALSE
SilkToSilkClearance [All] p1: silktosilkclearance=0.15
SilkToSolderMaskClearance SilkscreenOverComponentPads [IsPad] p1: minsilkscreentomaskgap=0.025 clearancetoexposedcopper=FALSE
SolderMaskExpansion SolderMaskExpansion_Via [IsVia] p1: expansion=0.05 istentingtop=TRUE
SolderMaskExpansion [All] p2: expansion=0.05 istentingtop=FALSE
StubLength [All] p1: limit=3
SupplyNets "Schematic Supply Nets_15" [InNet('GND_ISO3')] p1: voltage=0.000
SupplyNets "Schematic Supply Nets_14" [InNet('P5V0_ISO2')] p2: voltage=0.000
SupplyNets "Schematic Supply Nets_13" [InNet('P5V0_ISO1')] p3: voltage=0.000
SupplyNets "Schematic Supply Nets_12" [InNet('P5V0_ISO3')] p4: voltage=0.000
SupplyNets "Schematic Supply Nets_11" [InNet('GND_ISO2')] p5: voltage=0.000
SupplyNets "Schematic Supply Nets_10" [InNet('GND_ISO1')] p6: voltage=0.000
SupplyNets "Schematic Supply Nets_9" [InNet('P5V0_ISO4')] p7: voltage=0.000
SupplyNets "Schematic Supply Nets_8" [InNet('CHASSIS')] p8: voltage=0.000
SupplyNets "Schematic Supply Nets_4" [InNet('GND_ISO4')] p9: voltage=0.000
SupplyNets "Schematic Supply Nets_7" [InNet('GND')] p10: voltage=0.000
SupplyNets "Schematic Supply Nets_6" [InNet('P3V3_MP2')] p11: voltage=0.000
SupplyNets "Schematic Supply Nets_3" [InNet('P3V3_MP')] p12: voltage=0.000
SupplyNets "Schematic Supply Nets_1" [InNet('P12V0')] p13: voltage=0.000
SupplyNets "Schematic Supply Nets" [InNet('P3V3')] p14: voltage=0.000
UnConnectedPin [All] p1 off:
UnRoutedNet [All] p1: checkbadconnections=TRUE
UnRoutedNet UnRoutedNet_esd_strip [Not (InNet('STRIP1') or InNet('FMC_VIO_B_M2C'))] p2:
UnpouredPolygon UnpouredPolygon_1 [InPolygonClass('Copper_Balancing')] p1: allowunpoured=TRUE
UnpouredPolygon [All] p2:
ViasUnderSMD [All] p1: allowed=TRUE
Width Width_pwr [InNetClass('PWR')] p1: maxlimit=2 minlimit=0.25 preferedwidth=1
Width Width_50Ohm [InNetClass('50Ohm')] p2: maxlimit=0.27 minlimit=0.11 preferedwidth=0.27 toplayer_minwidth=0.175 toplayer_maxwidth=0.175 toplayer_prefwidth=0.175 midlayer2_minwidth=0.27 midlayer7_minwidth=0.27 bottomlayer_minwidth=0.175 bottomlayer_maxwidth=0.175 bottomlayer_prefwidth=0.175 impedanceprofiledriven=TRUE impedanceprofileid={766963E9-4C46-4FD0-92C7-72FE31CC1419} impedanceprofilevalue=50.000000 minimp=50.000000 maximp=50.000000 favimp=50.000000
Width [All] p3: maxlimit=2 minlimit=0.12 preferedwidth=0.15
12 further rules are at their usual default settings.

## Classes and differential pairs
net class PWR_ISO: P5V0_ISO1 P5V0_ISO2 P5V0_ISO3 P5V0_ISO4
component class U_Temp_monitoring: T_C8 T_IC6 T_R25
component class U_PWR_Supply: T_C1 T_C2 T_IC1 T_R2 T_R4 T_R7 T_R8
component class U_Power-up_delay: T_C13 T_C14 T_C15 T_C16 T_C17 T_C18 T_C19 T_C20 T_C21 T_D6 T_IC7 T_R29 T_R30 T_R31 T_R32 T_R33 T_R34 T_T2 T_T3 T_T4 T_T5
component class "Power input connector": T_C9 T_C10 T_C11 T_D5 T_FL1 T_J6
component class Overlapping: T_J4
component class LEDs: T_LD1 T_LD2 T_LD3 T_LD4 T_R1 T_R3 T_R5 T_R6 T_T1 T_TP1 T_TP2 T_TP3 T_TP4 T_TP5 T_TP6 T_TP8
component class "I2C switch": T_C24 T_C25 T_IC9 T_R67 T_R68 T_R69
component class EEM_Connectors: T_C3 T_C4 T_C5 T_C6 T_D1 T_IC2 T_IC3 T_IC4 T_IC5 T_J1 T_J2
channel class ISO_DC_12_DC_5: ISO_DCDC_1 ISO_DCDC_2 ISO_DCDC_3 ISO_DCDC_4
component class ISO_DCDC_4: C39D C41D C42D C43D IC1D IC12D L5D L11D R69D
component class ISO_DCDC_3: C39C C41C C42C C43C IC1C IC12C L5C L11C R69C
component class ISO_DCDC_2: C39B C41B C42B C43B IC1B IC12B L5B L11B R69B
component class ISO_DCDC_1: C39A C41A C42A C43A IC1A IC12A L5A L11A R69A
net class 50Ohm: IO0A IO0B IO0C IO0D IO1A IO1B IO1C IO1D NetIC50A_7 NetIC50A_10 NetIC50B_7 NetIC50B_10 NetIC50C_7 NetIC50C_10 NetIC50D_7 NetIC50D_10 NetR207A_1 NetR207B_1 NetR207C_1 NetR207D_1 NetR211A_1 NetR211B_1 NetR211C_1 NetR211D_1
channel class Iso_SMA_MCX_Channel: Bank1 Bank2 Bank3 Bank4
net class GND_ISO: GND_ISO1 GND_ISO2 GND_ISO3 GND_ISO4
component class Bank4: B4D B5D B6D B7D B8D B9D B10D B11D B12D C32D C33D C56D C76D C77D C78D C88D C95D C100D D3D IC10D IC29D IC50D IC52D IC53D IC54D J15D J16D LD15D LD16D LD17D R29D R34D R87D R88D R202D R203D R204D R205D R206D R207D R208D R209D R210D R211D R212D R213D R214D R215D R216D R217D R218D R219D R220D R221D R222D R223D SW5D T19D T20D T21D T22D T23D TP1D
component class Bank3: B4C B5C B6C B7C B8C B9C B10C B11C B12C C32C C33C C56C C76C C77C C78C C88C C95C C100C D3C IC10C IC29C IC50C IC52C IC53C IC54C J15C J16C LD15C LD16C LD17C R29C R34C R87C R88C R202C R203C R204C R205C R206C R207C R208C R209C R210C R211C R212C R213C R214C R215C R216C R217C R218C R219C R220C R221C R222C R223C SW5C T19C T20C T21C T22C T23C TP1C
component class Bank2: B4B B5B B6B B7B B8B B9B B10B B11B B12B C32B C33B C56B C76B C77B C78B C88B C95B C100B D3B IC10B IC29B IC50B IC52B IC53B IC54B J15B J16B LD15B LD16B LD17B R29B R34B R87B R88B R202B R203B R204B R205B R206B R207B R208B R209B R210B R211B R212B R213B R214B R215B R216B R217B R218B R219B R220B R221B R222B R223B SW5B T19B T20B T21B T22B T23B TP1B
component class Bank1: B4A B5A B6A B7A B8A B9A B10A B11A B12A C32A C33A C56A C76A C77A C78A C88A C95A C100A D3A IC10A IC29A IC50A IC52A IC53A IC54A J15A J16A LD15A LD16A LD17A R29A R34A R87A R88A R202A R203A R204A R205A R206A R207A R208A R209A R210A R211A R212A R213A R214A R215A R216A R217A R218A R219A R220A R221A R222A R223A SW5A T19A T20A T21A T22A T23A TP1A
net class HPOW: P12V0
component class U_DIOT_SMA_EXT: C2 C55 C64 C65 C92 C106 C107 C108 C109 C110 C111 C112 C113 C114 C115 C116 C117 C118 IC3 IC13 J1 R4 R5 R6 R7 R8 R10 R11 R12 R13 R15 R25 R26 R27 R31 R36 R42 R55 R56 R85 R86 R89 R90 R91 R92 R93 R94 R95 R96 SW1 U2 U4
component class U_DIOT_SMA_BASE: C3 C15 C16 C17 C18 C19 C20 C21 C22 C23 C24 C25 C26 C27 C54 C75 C96 C97 IC32 IC46 R3 R9 R17 R18 R19 R20 R21 R22 R23 R24 R58 R59 R60 R61 R64 R71 R76 R82 R101 R103 R106 R114 R121 R129 SW2 U1 U3
component class U_DIOT_signal_routing: T_C22 T_C23 T_IC8 T_R35 T_R36 T_R37 T_R38 T_R39 T_R40 T_R41 T_R42 T_R43 T_R44 T_R45 T_R46 T_R47 T_R48 T_R49 T_R50 T_R51 T_R52 T_R53 T_R54 T_R55 T_R56 T_R57 T_R58 T_R59 T_R60 T_R61 T_R62 T_R63 T_R64 T_R65 T_R66
differential pair class MGT: BP_MGT.Rx BP_MGT.Tx BP_MGT_Rx BP_MGT_Tx FMC_MGT.DP_C2M0 FMC_MGT.DP_C2M1 FMC_MGT.DP_C2M2 FMC_MGT.DP_C2M3 FMC_MGT.DP_C2M4 FMC_MGT.DP_C2M5 FMC_MGT.DP_C2M6 FMC_MGT.DP_C2M7 FMC_MGT.DP_C2M8 FMC_MGT.DP_C2M9 FMC_MGT.DP_M2C0 FMC_MGT.DP_M2C1 FMC_MGT.DP_M2C2 FMC_MGT.DP_M2C3 FMC_MGT.DP_M2C4 FMC_MGT.DP_M2C5 FMC_MGT.DP_M2C6 FMC_MGT.DP_M2C7 FMC_MGT.DP_M2C8 FMC_MGT.DP_M2C9 MGT_RX0 MGT_RX1 MGT_RX2 MGT_RX3 MGT_RXC3 MGT_TX0 MGT_TX1 MGT_TX2 MGT_TX3 MGT_TXC3
net class ESD_STRIP: CHASSIS STRIP2 STRIP3
net class PWR: NetT_C2_2 NetT_C11_2 P3V3 P3V3_MP P12V0
differential pair class Diff_100Ohm: BP_CLK.CLK CK_MMCX CK_MMCX_ALT CK_MMCX_IN CK_OSC CK_OSC_ALT CK_SMA CK_SMA_ALT CK_SMA_IN DDR3_CK DDR3_LDQS DDR3_UDQS EEM_IO.LVDS0 EEM_IO.LVDS1 EEM_IO.LVDS2 EEM_IO.LVDS3 EEM_IO.LVDS4 EEM_IO.LVDS5 EEM_IO.LVDS6 EEM_IO.LVDS7 EEM_IO.LVDS8 EEM_IO.LVDS9 EEM_IO.LVDS10 EEM_IO.LVDS11 EEM_IO.LVDS12 EEM_IO.LVDS13 EEM_IO.LVDS14 EEM_IO.LVDS15 FMC.HA0 FMC.HA1 FMC.HA2 FMC.HA3 FMC.HA4 FMC.HA5 FMC.HA6 FMC.HA7 FMC.HA8 FMC.HA9 FMC.HA10 FMC.HA11 FMC.HA12 FMC.HA13 FMC.HA14 FMC.HA15 FMC.HA16 FMC.HA17 FMC.HA18 FMC.HA19 FMC.HA20 FMC.HA21 FMC.HA22 FMC.HA23 FMC.HB0 FMC.HB1 FMC.HB2 FMC.HB3 FMC.HB4 FMC.HB5 FMC.HB6 FMC.HB7 FMC.HB8 FMC.HB9 FMC.HB10 FMC.HB11 FMC.HB12 FMC.HB13 FMC.HB14 FMC.HB15 FMC.HB16 FMC.HB17 FMC.HB18 FMC.HB19 FMC.HB20 FMC.HB21 FMC.LA0 FMC.LA1 FMC.LA2 FMC.LA3 FMC.LA4 FMC.LA5 FMC.LA6 FMC.LA7 FMC.LA8 FMC.LA9 FMC.LA10 FMC.LA11 FMC.LA12 FMC.LA13 FMC.LA14 FMC.LA15 FMC.LA16 FMC.LA17 FMC.LA18 FMC.LA19 FMC.LA20 FMC.LA21 FMC.LA22 FMC.LA23 FMC.LA24 FMC.LA25 FMC.LA26 FMC.LA27 FMC.LA28 FMC.LA29 FMC.LA30 FMC.LA31 FMC.LA32 FMC.LA33 FMC_CLK.CLK_BIDIR2 FMC_CLK.CLK_BIDIR3 FMC_CLK.CLK_M2C0 FMC_CLK.CLK_M2C1 FMC_MGT.GBTCLK_M2C0 FMC_MGT.GBTCLK_M2C1 GBTCLK0_M2C LVDS_DUAL0 LVDS_DUAL1 LVDS_DUAL2 LVDS_DUAL3 LVDS_DUAL4 LVDS_DUAL.LVDS0 LVDS_DUAL.LVDS1 LVDS_DUAL.LVDS2 LVDS_DUAL.LVDS3 LVDS_DUAL.LVDS4 LVDS_JTAG_TCK LVDS_JTAG_TDI LVDS_JTAG_TDO LVDS_JTAG_TMS LVDS_JTAG_TRSTn MGT_OR_LVDS OSC PE_CK PE_CLK PE_CLK.CLK PE_CLK_ALT
net class GA[0..3]: GA0 GA1 GA2 GA3
net class EEM_IO.LVDS_P[0..15]: EEM_IO.LVDS_P0 EEM_IO.LVDS_P1 EEM_IO.LVDS_P2 EEM_IO.LVDS_P3 EEM_IO.LVDS_P4 EEM_IO.LVDS_P5 EEM_IO.LVDS_P6 EEM_IO.LVDS_P7 EEM_IO.LVDS_P8 EEM_IO.LVDS_P9 EEM_IO.LVDS_P10 EEM_IO.LVDS_P11 EEM_IO.LVDS_P12 EEM_IO.LVDS_P13 EEM_IO.LVDS_P14 EEM_IO.LVDS_P15
net class EEM_IO.LVDS_N[0..15]: EEM_IO.LVDS_N0 EEM_IO.LVDS_N1 EEM_IO.LVDS_N2 EEM_IO.LVDS_N3 EEM_IO.LVDS_N4 EEM_IO.LVDS_N5 EEM_IO.LVDS_N6 EEM_IO.LVDS_N7 EEM_IO.LVDS_N8 EEM_IO.LVDS_N9 EEM_IO.LVDS_N10 EEM_IO.LVDS_N11 EEM_IO.LVDS_N12 EEM_IO.LVDS_N13 EEM_IO.LVDS_N14 EEM_IO.LVDS_N15
net class BP_IO.LVDS_P[0..15]: BP_IO.LVDS_P0 BP_IO.LVDS_P1 BP_IO.LVDS_P2 BP_IO.LVDS_P3 BP_IO.LVDS_P4 BP_IO.LVDS_P5 BP_IO.LVDS_P6 BP_IO.LVDS_P7 BP_IO.LVDS_P8 BP_IO.LVDS_P9 BP_IO.LVDS_P10 BP_IO.LVDS_P11 BP_IO.LVDS_P12 BP_IO.LVDS_P13 BP_IO.LVDS_P14 BP_IO.LVDS_P15
net class BP_IO.LVDS_N[0..15]: BP_IO.LVDS_N0 BP_IO.LVDS_N1 BP_IO.LVDS_N2 BP_IO.LVDS_N3 BP_IO.LVDS_N4 BP_IO.LVDS_N5 BP_IO.LVDS_N6 BP_IO.LVDS_N7 BP_IO.LVDS_N8 BP_IO.LVDS_N9 BP_IO.LVDS_N10 BP_IO.LVDS_N11 BP_IO.LVDS_N12 BP_IO.LVDS_N13 BP_IO.LVDS_N14 BP_IO.LVDS_N15
component class CPCIS_Connectors_P1_P6: C MX T_D2 T_D3 T_J4 T_J5 T_R13 T_R14 T_R15 T_R16 T_R17 T_R18 T_R19
component class U_Mechanical: FTG1 FTG2 FTG3 FTG4 FTG5 FTG6 M5 M6 M7 M8 M9 M10 MP1 MP2 MP3 MP4 MP5 MP6 T_B1 T_B2 T_C12 T_M1 T_M2 T_M3 T_M4 T_R26 T_R27 T_R28
component class U_Power_main_DCDC: C1 C80 C81 C82 C83 C84 C85 C86 C87 IC17 L9 L10 R1 R2 R51 R53 R68
differential pair EEM_IO.LVDS4: +EEM_IO.LVDS_P4 -EEM_IO.LVDS_N4
differential pair EEM_IO.LVDS3: +EEM_IO.LVDS_P3 -EEM_IO.LVDS_N3
differential pair EEM_IO.LVDS2: +EEM_IO.LVDS_P2 -EEM_IO.LVDS_N2
differential pair EEM_IO.LVDS1: +EEM_IO.LVDS_P1 -EEM_IO.LVDS_N1
differential pair EEM_IO.LVDS0: +EEM_IO.LVDS_P0 -EEM_IO.LVDS_N0
differential pair BP_CLK.CLK: +BP_CLK.CLK_P -BP_CLK.CLK_N
differential pair EEM_IO.LVDS15: +EEM_IO.LVDS_P15 -EEM_IO.LVDS_N15
differential pair EEM_IO.LVDS14: +EEM_IO.LVDS_P14 -EEM_IO.LVDS_N14
differential pair EEM_IO.LVDS13: +EEM_IO.LVDS_P13 -EEM_IO.LVDS_N13
differential pair EEM_IO.LVDS12: +EEM_IO.LVDS_P12 -EEM_IO.LVDS_N12
differential pair EEM_IO.LVDS11: +EEM_IO.LVDS_P11 -EEM_IO.LVDS_N11
differential pair EEM_IO.LVDS10: +EEM_IO.LVDS_P10 -EEM_IO.LVDS_N10
differential pair EEM_IO.LVDS9: +EEM_IO.LVDS_P9 -EEM_IO.LVDS_N9
differential pair EEM_IO.LVDS8: +EEM_IO.LVDS_P8 -EEM_IO.LVDS_N8
differential pair EEM_IO.LVDS7: +EEM_IO.LVDS_P7 -EEM_IO.LVDS_N7
differential pair EEM_IO.LVDS6: +EEM_IO.LVDS_P6 -EEM_IO.LVDS_N6
differential pair EEM_IO.LVDS5: +EEM_IO.LVDS_P5 -EEM_IO.LVDS_N5
differential pair BP_MGT_Tx: +BP_MGT_Tx_P -BP_MGT_Tx_N
differential pair BP_MGT_Rx: +BP_MGT_Rx_P -BP_MGT_Rx_N
differential pair BP_IO.LVDS15: +BP_IO.LVDS_P15 -BP_IO.LVDS_N15
differential pair BP_IO.LVDS14: +BP_IO.LVDS_P14 -BP_IO.LVDS_N14
differential pair BP_IO.LVDS13: +BP_IO.LVDS_P13 -BP_IO.LVDS_N13
differential pair BP_IO.LVDS12: +BP_IO.LVDS_P12 -BP_IO.LVDS_N12
differential pair BP_IO.LVDS11: +BP_IO.LVDS_P11 -BP_IO.LVDS_N11
differential pair BP_IO.LVDS10: +BP_IO.LVDS_P10 -BP_IO.LVDS_N10
differential pair BP_IO.LVDS9: +BP_IO.LVDS_P9 -BP_IO.LVDS_N9
differential pair BP_IO.LVDS8: +BP_IO.LVDS_P8 -BP_IO.LVDS_N8
differential pair BP_IO.LVDS7: +BP_IO.LVDS_P7 -BP_IO.LVDS_N7
differential pair BP_IO.LVDS6: +BP_IO.LVDS_P6 -BP_IO.LVDS_N6
differential pair BP_IO.LVDS5: +BP_IO.LVDS_P5 -BP_IO.LVDS_N5
differential pair BP_IO.LVDS4: +BP_IO.LVDS_P4 -BP_IO.LVDS_N4
differential pair BP_IO.LVDS3: +BP_IO.LVDS_P3 -BP_IO.LVDS_N3
differential pair BP_IO.LVDS2: +BP_IO.LVDS_P2 -BP_IO.LVDS_N2
differential pair BP_IO.LVDS1: +BP_IO.LVDS_P1 -BP_IO.LVDS_N1
differential pair BP_IO.LVDS0: +BP_IO.LVDS_P0 -BP_IO.LVDS_N0

## Components (designator, comment, footprint, x,y, rotation, side; value= is the part's Value field where it differs from the comment)
B4A "SMD Pad" C100 35.295,72.934 r270 top (schematic designator B4)
B4B "SMD Pad" C100 37.218,52.5 r270 top (schematic designator B4)
B4C "SMD Pad" C100 36.4,30.2 r270 top (schematic designator B4)
B4D "SMD Pad" C100 73.6,6.2 r270 top (schematic designator B4)
B5A "SMD Pad" C100 89.954,65.572 r270 bottom (schematic designator B5)
B5B "SMD Pad" C100 69.6,64.6 r270 bottom (schematic designator B5)
B5C "SMD Pad" C100 57.961,38.3 r270 top (schematic designator B5)
B5D "SMD Pad" C100 105,28.9 r270 top (schematic designator B5)
B6A "SMD Pad" C100 34.12,76.416 r270 top (schematic designator B6)
B6B "SMD Pad" C100 35.632,54.8 r270 top (schematic designator B6)
B6C "SMD Pad" C100 37.7,33.1 r270 top (schematic designator B6)
B6D "SMD Pad" C100 73.6,8.653 r270 top (schematic designator B6)
B7A "SMD Pad" C100 95.393,57.25 r270 bottom (schematic designator B7)
B7B "SMD Pad" C100 69.8,61.3 r270 bottom (schematic designator B7)
B7C "SMD Pad" C100 60.231,38.3 r270 top (schematic designator B7)
B7D "SMD Pad" C100 107.178,28.622 r270 bottom (schematic designator B7)
B8A "SMD Pad" C100 93.571,65.429 r270 bottom (schematic designator B8)
B8B "SMD Pad" C100 64.7,63.7 r270 top (schematic designator B8)
B8C "SMD Pad" C100 81.361,39.661 r270 bottom (schematic designator B8)
B8D "SMD Pad" C100 94,28.347 r270 bottom (schematic designator B8)
B9A "SMD Pad" C100 76.858,62.9 r270 bottom (schematic designator B9)
B9B "SMD Pad" C100 72,61.2 r270 bottom (schematic designator B9)
B9C "SMD Pad" C100 80.3,35.9 r270 bottom (schematic designator B9)
B9D "SMD Pad" C100 93.6,29.3 r270 top (schematic designator B9)
B10A "SMD Pad" C100 96.751,78.019 r270 top (schematic designator B10)
B10B "SMD Pad" C100 69.9,50.896 r270 top (schematic designator B10)
B10C "SMD Pad" C100 69.5,19.4 r270 top (schematic designator B10)
B10D "SMD Pad" C100 117.8,8.2 r270 top (schematic designator B10)
B11A "SMD Pad" C100 18.743,82.143 r270 top (schematic designator B11)
B11B "SMD Pad" C100 36.9,63.8 r270 top (schematic designator B11)
B11C "SMD Pad" C100 61,15.7 r270 top (schematic designator B11)
B11D "SMD Pad" C100 110.7,6.1 r270 top (schematic designator B11)
B12A "SMD Pad" C100 85.7,85.6 r270 top (schematic designator B12)
B12B "SMD Pad" C100 38.275,67.386 r270 top (schematic designator B12)
B12C "SMD Pad" C100 66.2,18 r270 top (schematic designator B12)
B12D "SMD Pad" C100 19.2,6.3 r270 top (schematic designator B12)
C1 "1nF" CAPC1005X55N 157.2,81.9 r90 top
C2 "100nF" CAPC1005X55N 165.9,40.268 r180 top
C3 "100nF" CAPC1005X55N 106.347,39.178 r180 bottom
C15 "100nF" CAPC1005X55N 105.833,34.221 r90 bottom
C16 "100nF" CAPC1005X55N 105.508,59.308 r270 bottom
C17 "100nF" CAPC1005X55N 105.508,53.258 r90 bottom
C18 "100nF" CAPC1005X55N 102.618,51.317 r90 bottom
C19 "100nF" CAPC1005X55N 101.239,51.896 r0 bottom
C20 "100nF" CAPC1005X55N 97.5,51.9 r0 bottom
C21 "100nF" CAPC1005X55N 98.371,61.167 r180 bottom
C22 "100nF" CAPC1005X55N 102.946,31.861 r90 bottom
C23 "100nF" CAPC1005X55N 102.023,31.859 r90 bottom
C24 "100nF" CAPC1005X55N 98.546,32.261 r180 bottom
C25 "100nF" CAPC1005X55N 97.99,41.561 r0 bottom
C26 "100nF" CAPC1005X55N 101.9,42 r270 bottom
C27 "100nF" CAPC1005X55N 102.846,41.961 r270 bottom
C32A "100nF" CAPC1005X55N 33.2,78.9 r90 top (schematic designator C32)
C32B "100nF" CAPC1005X55N 33.7,59.256 r180 top (schematic designator C32)
C32C "100nF" CAPC1005X55N 33.7,37.414 r180 top (schematic designator C32)
C32D "100nF" CAPC1005X55N 33.679,18.035 r180 top (schematic designator C32)
C33A "100nF" CAPC1005X55N 33.65,73 r180 top (schematic designator C33)
C33B "100nF" CAPC1005X55N 33.7,52.871 r180 top (schematic designator C33)
C33C "100nF" CAPC1005X55N 33.7,31.029 r180 top (schematic designator C33)
C33D "100nF" CAPC1005X55N 33.733,11.65 r180 top (schematic designator C33)
C39A "1uF" CAPMP6032X280N 114.7,63 r270 top (schematic designator C39)
C39B "1uF" CAPMP6032X280N 88.9,57 r0 top (schematic designator C39)
C39C "1uF" CAPMP6032X280N 88.8,34.1 r0 top (schematic designator C39)
C39D "1uF" CAPMP6032X280N 118.4,30 r270 top (schematic designator C39)
C41A "100nF" CAPC1005X55N 117.2,64 r90 top (schematic designator C41)
C41B "100nF" CAPC1005X55N 85.4,61.1 r270 top (schematic designator C41)
C41C "100nF" CAPC1005X55N 84.7,37.1 r0 top (schematic designator C41)
C41D "100nF" CAPC1005X55N 120.9,31.9 r90 top (schematic designator C41)
C42A "4.7uF" CAPMP3216X180N 92.5,83.4 r180 top (schematic designator C42)
C42B "4.7uF" CAPMP3216X180N 71.1,44.8 r0 top (schematic designator C42)
C42C "4.7uF" CAPMP3216X180N 80.4,14.9 r270 top (schematic designator C42)
C42D "4.7uF" CAPMP3216X180N 130.9,8.9 r90 top (schematic designator C42)
C43A "100nF" CAPC1005X55N 92.2,81.6 r0 top (schematic designator C43)
C43B "100nF" CAPC1005X55N 70.9,46.4 r180 top (schematic designator C43)
C43C "100nF" CAPC1005X55N 78.7,14.8 r90 top (schematic designator C43)
C43D "100nF" CAPC1005X55N 129,10 r270 top (schematic designator C43)
C54 "100nF" CAPC1005X55N 100.625,42.643 r270 top
C55 "100nF" CAPC1005X55N 154.31,40.234 r180 top
C56A "100nF" CAPC1005X55N 30.291,70.541 r270 bottom (schematic designator C56)
C56B "100nF" CAPC1005X55N 39.2,49.5 r90 top (schematic designator C56)
C56C "100nF" CAPC1005X55N 39.5,28.3 r270 top (schematic designator C56)
C56D "100nF" CAPC1005X55N 27.848,3.478 r90 top (schematic designator C56)
C64 "100nF" CAPC1005X55N 133.2,66 r90 top
C65 "100nF" CAPC1005X55N 133.2,71.7 r270 top
C75 "100nF" CAPC1005X55N 119.296,40.255 r0 top
C76A "100nF" CAPC1005X55N 85.965,83.107 r0 top (schematic designator C76)
C76B "100nF" CAPC1005X55N 53.7,49.033 r180 top (schematic designator C76)
C76C "100nF" CAPC1005X55N 53.426,18.013 r180 top (schematic designator C76)
C76D "100nF" CAPC1005X55N 101.75,7.633 r180 top (schematic designator C76)
C77A "100nF" CAPC1005X55N 88,64.7 r270 top (schematic designator C77)
C77B "100nF" CAPC1005X55N 53.2,69.133 r270 top (schematic designator C77)
C77C "100nF" CAPC1005X55N 52.926,38.113 r270 top (schematic designator C77)
C77D "100nF" CAPC1005X55N 101.25,27.733 r270 top (schematic designator C77)
C78A "100nF" CAPC1005X55N 65.24,65.628 r270 top (schematic designator C78)
C78B "100nF" CAPC1005X55N 50.668,68.632 r0 top (schematic designator C78)
C78C "100nF" CAPC1005X55N 50.4,37.6 r0 top (schematic designator C78)
C78D "100nF" CAPC1005X55N 98.6,27.2 r0 top (schematic designator C78)
C80 "100nF" CAPC1005X55N 150.143,71.55 r0 top
C81 "100nF" CAPC1005X55N 150.143,73.55 r0 top
C82 "22uF" CAPC2012X135N 153.343,71.55 r180 top
C83 "22uF" CAPC2012X135N 153.343,73.55 r180 top
C84 "22uF" CAPC2012X135N 148.693,66.15 r270 top
C85 "10uF" CAPMP3216X180N 145.943,66.6 r90 top
C86 "100nF" CAPC1005X55N 159.443,78.5 r90 top
C87 "22uF" CAPC2012X135N 161.193,78.4 r90 top
C88A "100nF" CAPC1005X55N 65.2,80.9 r90 top (schematic designator C88)
C88B "100nF" CAPC1005X55N 51.068,48.532 r90 top (schematic designator C88)
C88C "100nF" CAPC1005X55N 50.8,17.5 r90 top (schematic designator C88)
C88D "100nF" CAPC1005X55N 99,7.1 r90 top (schematic designator C88)
C92 "100nF" CAPC1005X55N 130.287,73.869 r270 top
C95A "100nF" CAPC1005X55N 15,77.4 r270 top (schematic designator C95)
C95B "100nF" CAPC1005X55N 15,57.4 r270 top (schematic designator C95)
C95C "100nF" CAPC1005X55N 15,35.6 r270 top (schematic designator C95)
C95D "100nF" CAPC1005X55N 14.187,16.692 r270 top (schematic designator C95)
C96 "100nF" CAPC1005X55N 101.417,61.135 r0 bottom
C97 "100nF" CAPC1005X55N 102.808,61.608 r270 bottom
C100A "100nF" CAPC1005X55N 15.093,67.646 r270 top (schematic designator C100)
C100B "100nF" CAPC1005X55N 15.093,47.646 r270 top (schematic designator C100)
C100C "100nF" CAPC1005X55N 15.093,25.846 r270 top (schematic designator C100)
C100D "100nF" CAPC1005X55N 15.2,7.3 r270 top (schematic designator C100)
C106 "100nF" CAPC1005X55N 128.9,73.4 r0 top
C107 "100nF" CAPC1005X55N 125.8,73.4 r180 top
C108 "100nF" CAPC1005X55N 125.338,64.142 r0 top
C109 "100nF" CAPC1005X55N 129.1,64.1 r0 top
C110 "100nF" CAPC1005X55N 130.5,63.7 r90 top
C111 "100nF" CAPC1005X55N 150.519,20.019 r90 top
C112 "100nF" CAPC1005X55N 150.519,25.619 r270 top
C113 "100nF" CAPC1005X55N 147.677,27.908 r270 top
C114 "100nF" CAPC1005X55N 146.291,27.466 r0 top
C115 "100nF" CAPC1005X55N 142.519,27.419 r0 top
C116 "100nF" CAPC1005X55N 142.419,18.219 r0 top
C117 "100nF" CAPC1005X55N 146.219,18.219 r0 top
C118 "100nF" CAPC1005X55N 147.581,17.764 r90 top
D3A "D1213A-02SR-7" SOT190P238X100-4N 4.7,72.6 r90 top (schematic designator D3)
D3B "D1213A-02SR-7" SOT190P238X100-4N 4.7,52.6 r90 top (schematic designator D3)
D3C "D1213A-02SR-7" SOT190P238X100-4N 4.7,30.8 r90 top (schematic designator D3)
D3D "D1213A-02SR-7" SOT190P238X100-4N 4.7,11.6 r90 top (schematic designator D3)
FTG1 "Use only in PCB" FIDUCIAL_TOP_C100-200 5.8,88.8 r90 top
FTG2 "Use only in PCB" FIDUCIAL_TOP_S100-200 213.5,60.8 r90 top
FTG3 "Use only in PCB" FIDUCIAL_TOP_S100-200 6,0.1 r90 top
FTG4 "Use only in PCB" FIDUCIAL_TOP_C100-200 211.2,12.6 r90 bottom
FTG5 "Use only in PCB" FIDUCIAL_TOP_S100-200 5.9,88.8 r90 bottom
FTG6 "Use only in PCB" FIDUCIAL_TOP_S100-200 8.4,-0.7 r90 bottom
IC1A "1769205241" WPME-FISM_SMT-8_L13.2W11.4H7.25 104.873,72.913 r90 top (schematic designator IC1)
IC1B "1769205241" WPME-FISM_SMT-8_L13.2W11.4H7.25 81.3,47.1 r180 top (schematic designator IC1)
IC1C "1769205241" WPME-FISM_SMT-8_L13.2W11.4H7.25 80.779,24.671 r270 top (schematic designator IC1)
IC1D "1769205241" WPME-FISM_SMT-8_L13.2W11.4H7.25 129.104,19.511 r270 top (schematic designator IC1)
IC3 "SN65MLVD040RGZT" QFN50P700X700X100-49N-S420 128.608,68.767 r180 top
IC10A "MOCD207M" SOIC127P594X363-8N 90.394,73.267 r90 top (schematic designator IC10)
IC10B "MOCD207M" SOIC127P594X363-8N 66.053,55.852 r270 top (schematic designator IC10)
IC10C "MOCD207M" SOIC127P594X363-8N 65.626,24.513 r270 top (schematic designator IC10)
IC10D "MOCD207M" SOIC127P594X363-8N 113.95,14.532 r270 top (schematic designator IC10)
IC12A "R1SE-1205/H2-R" R1SE-1205_H2-R 104.745,72.905 r90 top (schematic designator IC12)
IC12B "R1SE-1205/H2-R" R1SE-1205_H2-R 81.318,47.129 r180 top (schematic designator IC12)
IC12C "R1SE-1205/H2-R" R1SE-1205_H2-R 80.779,24.671 r270 top (schematic designator IC12)
IC12D "R1SE-1205/H2-R" R1SE-1205_H2-R 129.1,19.5 r270 top (schematic designator IC12)
IC13 "SN65MLVD040RGZT" QFN50P700X700X100-49N-S420 145.9,22.819 r180 top
IC17 "TPS62148RGX" TEXAS_RGX0011A 156.943,78.8 r0 top
IC29A "MCP810T-315I/TT" SOT95P237X112-3N 32.7,70.1 r180 bottom (schematic designator IC29)
IC29B "MCP810T-315I/TT" SOT95P237X112-3N 36.8,50 r0 top (schematic designator IC29)
IC29C "MCP810T-315I/TT" SOT95P237X112-3N 37.1,27.9 r0 top (schematic designator IC29)
IC29D "MCP810T-315I/TT" SOT95P237X112-3N 30.3,3.9 r180 top (schematic designator IC29)
IC32 "SN65MLVD040RGZT" QFN50P700X700X100-49N-S420 100.843,56.508 r180 bottom
IC46 "SN65MLVD040RGZT" QFN50P700X700X100-49N-S420 101.209,36.911 r180 bottom
IC50A "SN74ABTH25245DW" SOIC127P1030X265-24N 26.8,76.115 r0 top (schematic designator IC50)
IC50B "SN74ABTH25245DW" SOIC127P1030X265-24N 26.8,56.05 r0 top (schematic designator IC50)
IC50C "SN74ABTH25245DW" SOIC127P1030X265-24N 26.8,34.25 r0 top (schematic designator IC50)
IC50D "SN74ABTH25245DW" SOIC127P1030X265-24N 26.797,14.806 r0 top (schematic designator IC50)
IC52A "ISO7820DWW" SOIC127P1720X265-16N 82.05,72.767 r270 top (schematic designator IC52)
IC52B "ISO7820DWW" SOIC127P1720X265-16N 57.6,58.833 r90 top (schematic designator IC52)
IC52C "ISO7820DWW" SOIC127P1720X265-16N 57.326,27.813 r90 top (schematic designator IC52)
IC52D "ISO7820DWW" SOIC127P1720X265-16N 105.65,17.433 r90 top (schematic designator IC52)
IC53A "ISO7820DWW" SOIC127P1720X265-16N 71.159,72.767 r90 top (schematic designator IC53)
IC53B "ISO7820DWW" SOIC127P1720X265-16N 46.668,58.832 r270 top (schematic designator IC53)
IC53C "ISO7820DWW" SOIC127P1720X265-16N 46.4,27.8 r270 top (schematic designator IC53)
IC53D "ISO7820DWW" SOIC127P1720X265-16N 94.6,17.4 r270 top (schematic designator IC53)
IC54A "TLP183" TOSHIBA_11-4M1S 95.481,73.277 r90 top (schematic designator IC54)
IC54B "TLP183" TOSHIBA_11-4M1S 71.169,55.83 r270 top (schematic designator IC54)
IC54C "TLP183" TOSHIBA_11-4M1S 70.732,24.337 r270 top (schematic designator IC54)
IC54D "TLP183" TOSHIBA_11-4M1S 119.05,15.067 r270 top (schematic designator IC54)
J1 "52901-0674" FP-52901-0674-MFG 131,44.45 r270 top locked
J15A "Delock_65848" Delock_65848 1.9,80.3 r0 top locked (schematic designator J15)
J15B "Delock_65848" Delock_65848 1.9,60.3 r0 top locked (schematic designator J15)
J15C "Delock_65848" Delock_65848 1.9,38.5 r0 top locked (schematic designator J15)
J15D "Delock_65848" Delock_65848 1.9,18.5 r0 top locked (schematic designator J15)
J16A "MCX" AMPHENOL_919-383J-51A -1.6,70.3 r180 top locked (schematic designator J16)
J16B "MCX" AMPHENOL_919-383J-51A -1.6,50.3 r180 top locked (schematic designator J16)
J16C "MCX" AMPHENOL_919-383J-51A -1.6,28.5 r180 top locked (schematic designator J16)
J16D "MCX" AMPHENOL_919-383J-51A -1.6,8.5 r180 top locked (schematic designator J16)
L5A "10uH" IND_MURATA-PS_8400 98,82.4 r0 top (schematic designator L5)
L5B "10uH" IND_MURATA-PS_8400 71.4,41.4 r0 top (schematic designator L5)
L5C "10uH" IND_MURATA-PS_8400 84.4,15.2 r0 top (schematic designator L5)
L5D "10uH" IND_MURATA-PS_8400 134.4,9.2 r90 top (schematic designator L5)
L9 "10uH" IND_MURATA-PS_8400 152,66.3 r270 top
L10 "1.5uH" IND_TDK_SPM6530 151.443,78.8 r270 top
L11A "10uH" IND_MURATA-PS_8400 114.745,69.905 r270 top (schematic designator L11)
L11B "10uH" IND_MURATA-PS_8400 82.7,57.8 r90 top (schematic designator L11)
L11C "10uH" IND_MURATA-PS_8400 81.6,34.2 r0 top (schematic designator L11)
L11D "10uH" IND_MURATA-PS_8400 123.7,28.9 r180 top (schematic designator L11)
LD15A "Green" LED_AVAGO_HSME-C120#1 -5.1,81.8 r270 bottom locked (schematic designator LD15)
LD15B "Green" LED_AVAGO_HSME-C120#2 -5.1,61.8 r270 bottom locked (schematic designator LD15)
LD15C "Green" LED_AVAGO_HSME-C120#2 -5.1,40 r270 bottom locked (schematic designator LD15)
LD15D "Green" LED_AVAGO_HSME-C120#1 -5.1,20 r270 bottom locked (schematic designator LD15)
LD16A "Green" LED_AVAGO_HSME-C120#1 -5.1,81.8 r90 top locked (schematic designator LD16)
LD16B "Green" LED_AVAGO_HSME-C120#1 -5.1,61.8 r90 top locked (schematic designator LD16)
LD16C "Green" LED_AVAGO_HSME-C120#1 -5.1,40 r90 top locked (schematic designator LD16)
LD16D "Green" LED_AVAGO_HSME-C120#1 -5.1,20 r90 top locked (schematic designator LD16)
LD17A "APBA3010SURKSGC-F01" APBA3010SURKSGC-F01 -4.4,77 r90 top locked (schematic designator LD17)
LD17B "APBA3010SURKSGC-F01" APBA3010SURKSGC-F01 -4.4,57 r90 top locked (schematic designator LD17)
LD17C "APBA3010SURKSGC-F01" APBA3010SURKSGC-F01 -4.4,35.2 r90 top locked (schematic designator LD17)
LD17D "APBA3010SURKSGC-F01" APBA3010SURKSGC-F01 -4.4,15.2 r90 top locked (schematic designator LD17)
MP1 "9774120360R" 9774120360 15,1.2 r0 top locked
MP2 "9774120360R" 9774120360 65.5,1.2 r0 top locked
MP3 "9774120360R" 9774120360 15,88 r0 top locked
MP4 "9774120360R" 9774120360 65.5,88 r0 top locked
MP5 "9774120360R" 9774120360 131,88 r0 top locked
MP6 "9774120360R" 9774120360 131,1.2 r0 top locked
R1 "10k" RESC1005X40N 159.5,72.7 r0 top
R2 "ERJ-U120R00U" RESC4532X70N 152,66.2 r270 bottom value=0
R3 "10k" RESC1005X40N 99.1,50.9 r0 bottom
R4 "10k" RESC1005X40N 132.7,68.2 r0 bottom
R5 "100" RESC1005X40N 125.235,69.669 r180 bottom
R6 "100" RESC1005X40N 133,63.3 r90 top
R7 "10k" RESC1005X40N 129.9,72.7 r90 bottom
R8 "10k" RESC1005X40N 149.719,26.019 r0 bottom
R9 "10k" RESC1005X40N 99.98,42.673 r270 bottom
R10 "10k" RESC1005X40N 127.4,74.7 r90 top
R11 "10k" RESC1005X40N 144.132,17.755 r270 top
R12 "100" RESC1005X40N 134.542,67.358 r90 top
R13 "100" RESC1005X40N 134.1,70.4 r90 top
R15 "100" RESC1005X40N 133.3,73.8 r90 top
R17 "10k" RESC1005X40N 92.3,68.6 r270 top
R18 "10k" RESC1005X40N 89.6,68.6 r270 top
R19 "10k" RESC1005X40N 64.098,60.561 r90 top
R20 "10k" RESC1005X40N 66.677,60.574 r90 top
R21 "10k" RESC1005X40N 63.676,29.18 r90 top
R22 "10k" RESC1005X40N 66.309,29.226 r90 top
R23 "10k" RESC1005X40N 112.051,19.704 r90 top
R24 "10k" RESC1005X40N 114.8,19.7 r90 top
R25 "10k" RESC1005X40N 146.819,19.519 r270 bottom
R26 "100" RESC1005X40N 142.38,22.354 r180 bottom
R27 "100" RESC1005X40N 150.548,17.953 r90 top
R29A "510" RESC1005X40N 91,68.6 r270 top (schematic designator R29)
R29B "510" RESC1005X40N 65.601,60.539 r90 top (schematic designator R29)
R29C "510" RESC1005X40N 64.982,29.203 r90 top (schematic designator R29)
R29D "510" RESC1005X40N 113.305,19.722 r90 top (schematic designator R29)
R31 "100" RESC1005X40N 152.119,21.308 r90 top
R34A "510" RESC1005X40N 88.5,68.6 r270 top (schematic designator R34)
R34B "510" RESC1005X40N 68.1,60.5 r90 top (schematic designator R34)
R34C "510" RESC1005X40N 67.751,29.196 r90 top (schematic designator R34)
R34D "510" RESC1005X40N 115.9,19.7 r90 top (schematic designator R34)
R36 "100" RESC1005X40N 152.119,24.319 r90 top
R42 "100" RESC1005X40N 150.419,27.919 r90 top
R51 "560k" RESC1608X55N 155.8,68.6 r90 top
R53 "150k" RESC1608X55N 158.089,67.829 r180 top
R55 "10k" RESC1005X40N 166.344,54.424 r270 top
R56 "No value" RESC1005X40N 165.424,54.427 r270 top
R58 "10k" RESC1005X40N 102.108,53.408 r270 top
R59 "10k" RESC1005X40N 101.508,60.508 r90 top
R60 "10k" RESC1005X40N 103.646,33.861 r270 top
R61 "100" RESC1005X40N 97.722,57.014 r180 top
R64 "100" RESC1005X40N 105.3,61.6 r270 bottom
R68 "100k" RESC1005X40N 158,83.3 r0 top
R69A "0" RESC3216X65N 105.9,73.9 r90 bottom (schematic designator R69)
R69B "0" RESC3216X65N 79.9,48.4 r180 bottom (schematic designator R69)
R69C "0" RESC3216X65N 81.6,24 r270 bottom (schematic designator R69)
R69D "0" RESC3216X65N 130.3,17.8 r270 bottom (schematic designator R69)
R71 "100" RESC1005X40N 106.443,57.915 r270 bottom
R76 "100" RESC1005X40N 105.843,55.008 r270 bottom
R82 "100" RESC1005X40N 104.9,51.4 r270 bottom
R85 "10k" RESC1005X40N 153.369,53.992 r0 top
R86 "No value" RESC1005X40N 154.808,54.515 r270 top
R87A "100" RESC1005X40N 91.017,77.947 r270 top (schematic designator R87)
R87B "100" RESC1005X40N 65.428,51.146 r90 top (schematic designator R87)
R87C "100" RESC1005X40N 65.001,19.806 r90 top (schematic designator R87)
R87D "100" RESC1005X40N 113.325,9.926 r90 top (schematic designator R87)
R88A "100" RESC1005X40N 88.462,77.978 r270 top (schematic designator R88)
R88B "100" RESC1005X40N 67.953,51.152 r90 top (schematic designator R88)
R88C "100" RESC1005X40N 67.526,19.813 r90 top (schematic designator R88)
R88D "100" RESC1005X40N 115.838,9.936 r90 top (schematic designator R88)
R89 "10k" RESC1005X40N 149.895,55.152 r180 top
R90 "10k" RESC1005X40N 148.995,54.152 r0 top
R91 "10k" RESC1005X40N 147.2,55.1 r180 top
R92 "10k" RESC1005X40N 146.3,54.1 r0 top
R93 "10k" RESC1005X40N 145.034,40.234 r0 top
R94 "10k" RESC1005X40N 145.9,39.3 r180 top
R95 "10k" RESC1005X40N 147.8,39.3 r0 top
R96 "10k" RESC1005X40N 148.734,40.234 r180 top
R101 "10k" RESC1005X40N 101.661,40.051 r270 top
R103 "100" RESC1005X40N 98.046,35.761 r180 top
R106 "100" RESC1005X40N 105.4,42 r270 bottom
R114 "100" RESC1005X40N 107.746,38.361 r270 bottom
R121 "100" RESC1005X40N 106.846,35.461 r270 bottom
R129 "100" RESC1005X40N 105.846,31.661 r270 bottom
R202A "Undefined" RESC1005X40N 33.218,68.639 r90 top (schematic designator R202)
R202B "Undefined" RESC1005X40N 33.2,48.6 r90 top (schematic designator R202)
R202C "Undefined" RESC1005X40N 33.3,26.77 r90 top (schematic designator R202)
R202D "Undefined" RESC1005X40N 31.9,6.2 r180 top (schematic designator R202)
R203A "30R" RESC3225X70N 16.1,74.15 r0 top (schematic designator R203)
R203B "30R" RESC3225X70N 16.1,54.15 r0 top (schematic designator R203)
R203C "30R" RESC3225X70N 16.1,32.35 r0 top (schematic designator R203)
R203D "30R" RESC3225X70N 16.1,13.95 r0 top (schematic designator R203)
R204A "22" RESC1005X40N 33.65,71.138 r0 top (schematic designator R204)
R204B "22" RESC1005X40N 33.7,51 r0 top (schematic designator R204)
R204C "22" RESC1005X40N 33.7,29.1 r0 top (schematic designator R204)
R204D "22" RESC1005X40N 33.685,9.834 r0 top (schematic designator R204)
R205A "22" RESC1005X40N 33.65,74.938 r0 top (schematic designator R205)
R205B "22" RESC1005X40N 33.7,54.8 r0 top (schematic designator R205)
R205C "22" RESC1005X40N 33.7,33 r0 top (schematic designator R205)
R205D "22" RESC1005X40N 33.682,13.583 r0 top (schematic designator R205)
R206A "10k" RESC1005X40N 19.4,74.145 r180 top (schematic designator R206)
R206B "10k" RESC1005X40N 19.4,54.145 r180 top (schematic designator R206)
R206C "10k" RESC1005X40N 19.4,32.345 r180 top (schematic designator R206)
R206D "10k" RESC1005X40N 19.4,12.9 r180 top (schematic designator R206)
R207A "49R9" RESC3225X70N 8.033,75.45 r270 top (schematic designator R207)
R207B "49R9" RESC3225X70N 8.033,55.45 r270 top (schematic designator R207)
R207C "49R9" RESC3225X70N 8.033,33.65 r270 top (schematic designator R207)
R207D "49R9" RESC3225X70N 8.133,14.95 r270 top (schematic designator R207)
R208A "30R" RESC3225X70N 16.1,70.35 r0 top (schematic designator R208)
R208B "30R" RESC3225X70N 16.1,50.35 r0 top (schematic designator R208)
R208C "30R" RESC3225X70N 16.1,28.55 r0 top (schematic designator R208)
R208D "30R" RESC3225X70N 16.1,10.133 r0 top (schematic designator R208)
R209A "0" RESC1005X40N 84.7,62.9 r180 top (schematic designator R209)
R209B "0" RESC1005X40N 54.9,68.7 r0 top (schematic designator R209)
R209C "0" RESC1005X40N 54.4,38.1 r90 top (schematic designator R209)
R209D "0" RESC1005X40N 102.458,27.727 r90 top (schematic designator R209)
R210A "10k" RESC1005X40N 19.4,70.335 r180 top (schematic designator R210)
R210B "10k" RESC1005X40N 19.4,50.335 r180 top (schematic designator R210)
R210C "10k" RESC1005X40N 19.4,28.535 r180 top (schematic designator R210)
R210D "10k" RESC1005X40N 19.4,9.099 r180 top (schematic designator R210)
R211A "49R9" RESC3225X70N 8.033,69.55 r90 top (schematic designator R211)
R211B "49R9" RESC3225X70N 8.033,49.55 r90 top (schematic designator R211)
R211C "49R9" RESC3225X70N 8.033,27.75 r90 top (schematic designator R211)
R211D "49R9" RESC3225X70N 8.133,9.15 r90 top (schematic designator R211)
R212A "510" RESC1005X40N -2.8,80.8 r180 bottom (schematic designator R212)
R212B "510" RESC1005X40N -2.8,60.8 r180 bottom (schematic designator R212)
R212C "510" RESC1005X40N -2.8,39 r180 bottom (schematic designator R212)
R212D "510" RESC1005X40N -2.83,19 r180 bottom (schematic designator R212)
R213A "510" RESC1005X40N -3.8,82.4 r90 top (schematic designator R213)
R213B "510" RESC1005X40N -3.8,62.4 r90 top (schematic designator R213)
R213C "510" RESC1005X40N -3.8,40.6 r90 top (schematic designator R213)
R213D "510" RESC1005X40N -3.8,22.1 r180 top (schematic designator R213)
R214A "0" RESC1005X40N 69,82.6 r180 top (schematic designator R214)
R214B "0" RESC1005X40N 49.868,48.532 r90 top (schematic designator R214)
R214C "0" RESC1005X40N 49.6,17.5 r90 top (schematic designator R214)
R214D "0" RESC1005X40N 97.8,7.1 r90 top (schematic designator R214)
R215A "510" RESC1005X40N -1.439,74.654 r180 bottom (schematic designator R215)
R215B "510" RESC1005X40N -1.439,54.654 r180 bottom (schematic designator R215)
R215C "510" RESC1005X40N -1.439,32.854 r180 bottom (schematic designator R215)
R215D "510" RESC1005X40N -1.5,12.9 r180 bottom (schematic designator R215)
R216A "100" RESC1005X40N 70.943,82.607 r180 top (schematic designator R216)
R216B "100" RESC1005X40N 47.304,48.57 r90 top (schematic designator R216)
R216C "100" RESC1005X40N 47,17.5 r90 top (schematic designator R216)
R216D "100" RESC1005X40N 95.25,7.033 r90 top (schematic designator R216)
R217A "510" RESC1005X40N -1.439,75.595 r180 bottom (schematic designator R217)
R217B "510" RESC1005X40N -1.439,55.595 r180 bottom (schematic designator R217)
R217C "510" RESC1005X40N -1.439,33.795 r180 bottom (schematic designator R217)
R217D "510" RESC1005X40N -1.5,13.8 r180 bottom (schematic designator R217)
R218A "10k" RESC1005X40N 14.099,67.684 r90 top (schematic designator R218)
R218B "10k" RESC1005X40N 14.099,47.684 r90 top (schematic designator R218)
R218C "10k" RESC1005X40N 14.099,25.884 r90 top (schematic designator R218)
R218D "10k" RESC1005X40N 14.2,7.3 r90 top (schematic designator R218)
R219A "10k" RESC1005X40N 14,77.4 r90 top (schematic designator R219)
R219B "10k" RESC1005X40N 14,57.4 r90 top (schematic designator R219)
R219C "10k" RESC1005X40N 14,35.6 r90 top (schematic designator R219)
R219D "10k" RESC1005X40N 15.107,16.691 r90 top (schematic designator R219)
R220A "10k" RESC1005X40N 16,70 r270 bottom (schematic designator R220)
R220B "10k" RESC1005X40N 16,50 r270 bottom (schematic designator R220)
R220C "10k" RESC1005X40N 16,28.2 r270 bottom (schematic designator R220)
R220D "10k" RESC1005X40N 16.2,7.9 r270 bottom (schematic designator R220)
R221A "510" RESC1005X40N 94.235,68.355 r270 top (schematic designator R221)
R221B "510" RESC1005X40N 72.9,60.3 r0 top (schematic designator R221)
R221C "510" RESC1005X40N 72,29.3 r90 top (schematic designator R221)
R221D "510" RESC1005X40N 120.333,19.971 r90 top (schematic designator R221)
R222A "22" RESC1005X40N 16.513,73.444 r0 bottom (schematic designator R222)
R222B "22" RESC1005X40N 16.513,53.444 r0 bottom (schematic designator R222)
R222C "22" RESC1005X40N 16.513,31.644 r0 bottom (schematic designator R222)
R222D "22" RESC1005X40N 14.2,12.6 r270 bottom (schematic designator R222)
R223A "10k" RESC1005X40N 13.4,74.7 r180 bottom (schematic designator R223)
R223B "10k" RESC1005X40N 13.4,54.7 r180 bottom (schematic designator R223)
R223C "10k" RESC1005X40N 13.4,32.9 r180 bottom (schematic designator R223)
R223D "10k" RESC1005X40N 12.4,14.3 r180 bottom (schematic designator R223)
SW1 "Switch" SW_OMRON_A6S-4102-H 119.1,85.3 r90 top
SW2 "Switch" SW_OMRON_A6S-4102-H 147.9,4.4 r90 top
SW5A "Switch" SW_OMRON_A6S-2102-H 76.943,87.9 r180 top (schematic designator SW5)
SW5B "Switch" SW_OMRON_A6S-2102-H 43.2,84.2 r180 top locked (schematic designator SW5)
SW5C "Switch" SW_OMRON_A6S-2102-H 43.2,4.7 r180 top (schematic designator SW5)